# Altium PCB STPMotorControl_1.PcbDoc
Units mm, origin at the board's own origin, x right, y up, seen from the top; angles counter-clockwise.
Board outline 115.25 x 87.88 mm, 6 copper layers (Top Layer, Int1 (GND), Int2 (Sign), Int3 (Sign), Int4 (GND), Bottom Layer), stack 1.551 mm thick; 90 components, 72 nets, 381 pads, 78 vias.
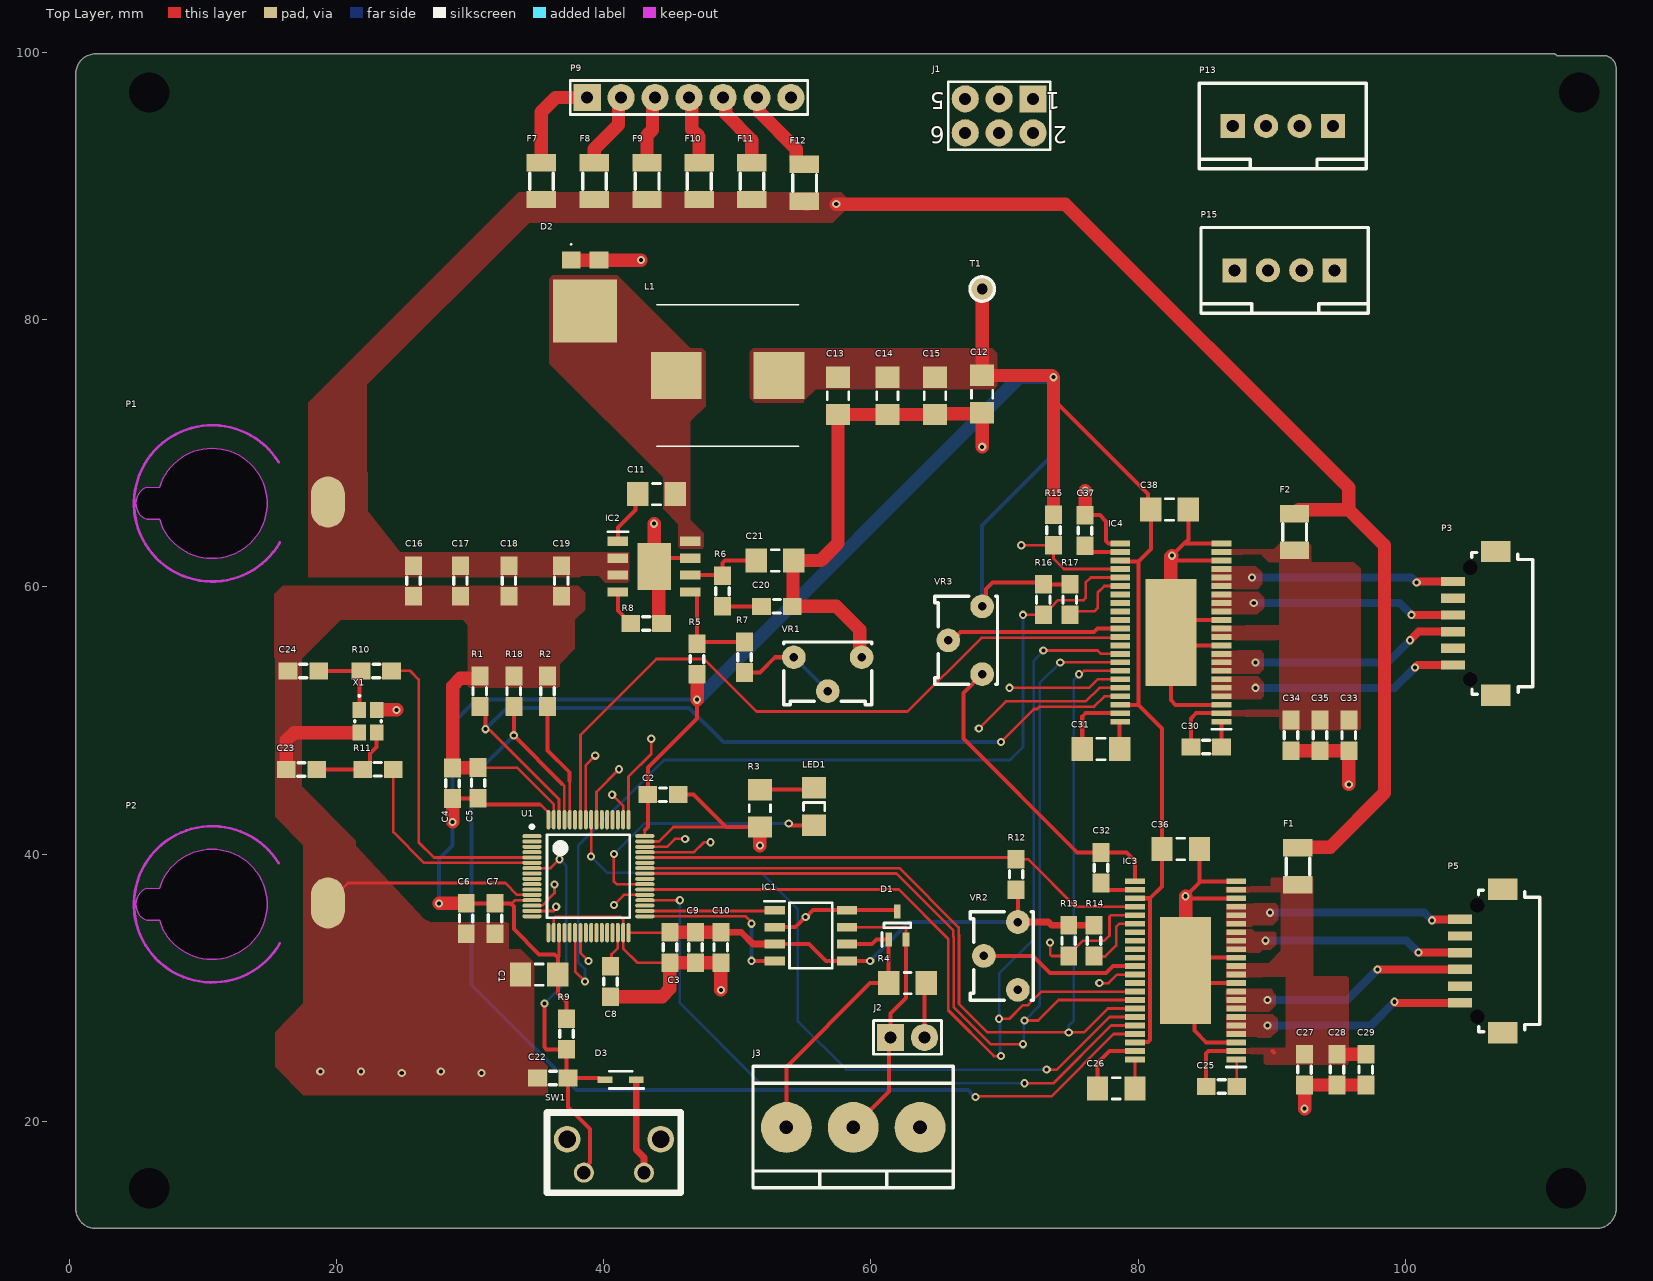
[diagram p0: Top Layer view]
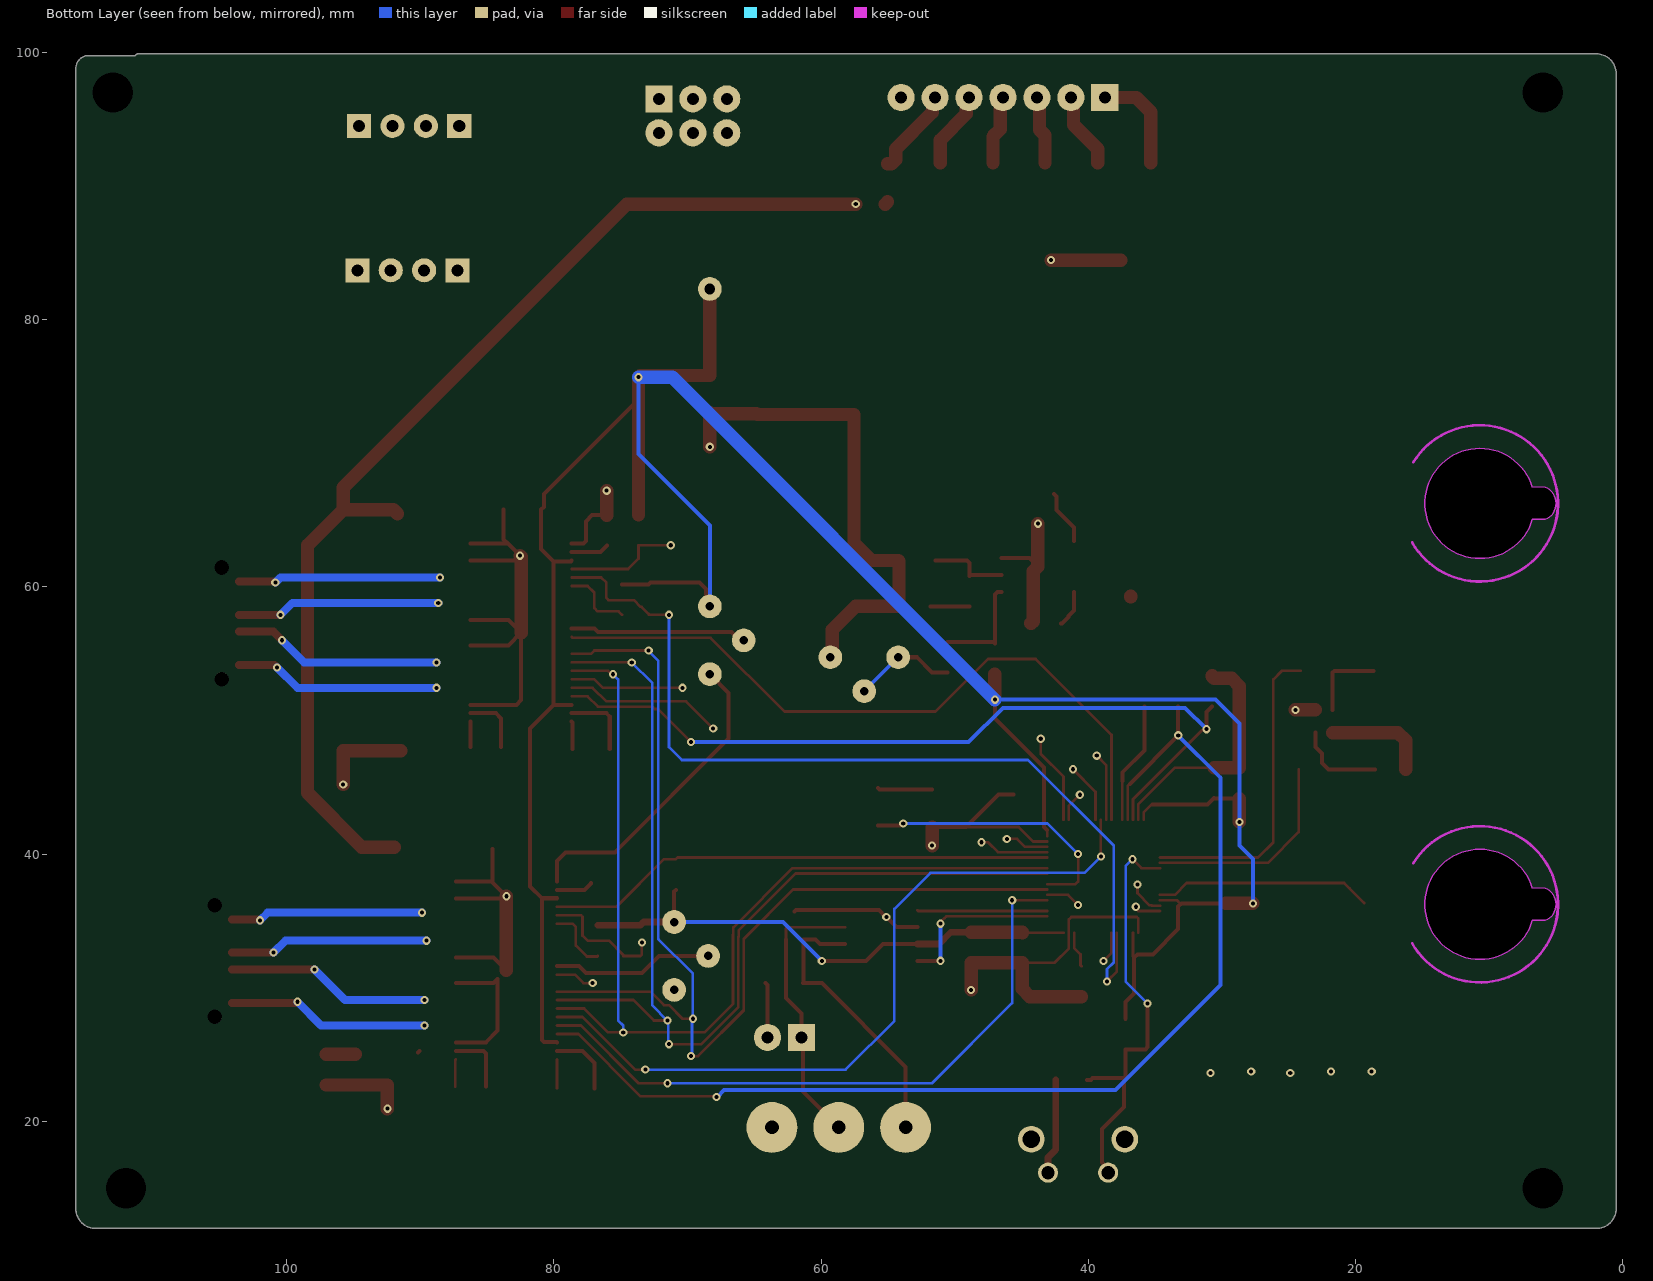
[diagram p1: Bottom Layer view, seen from below]
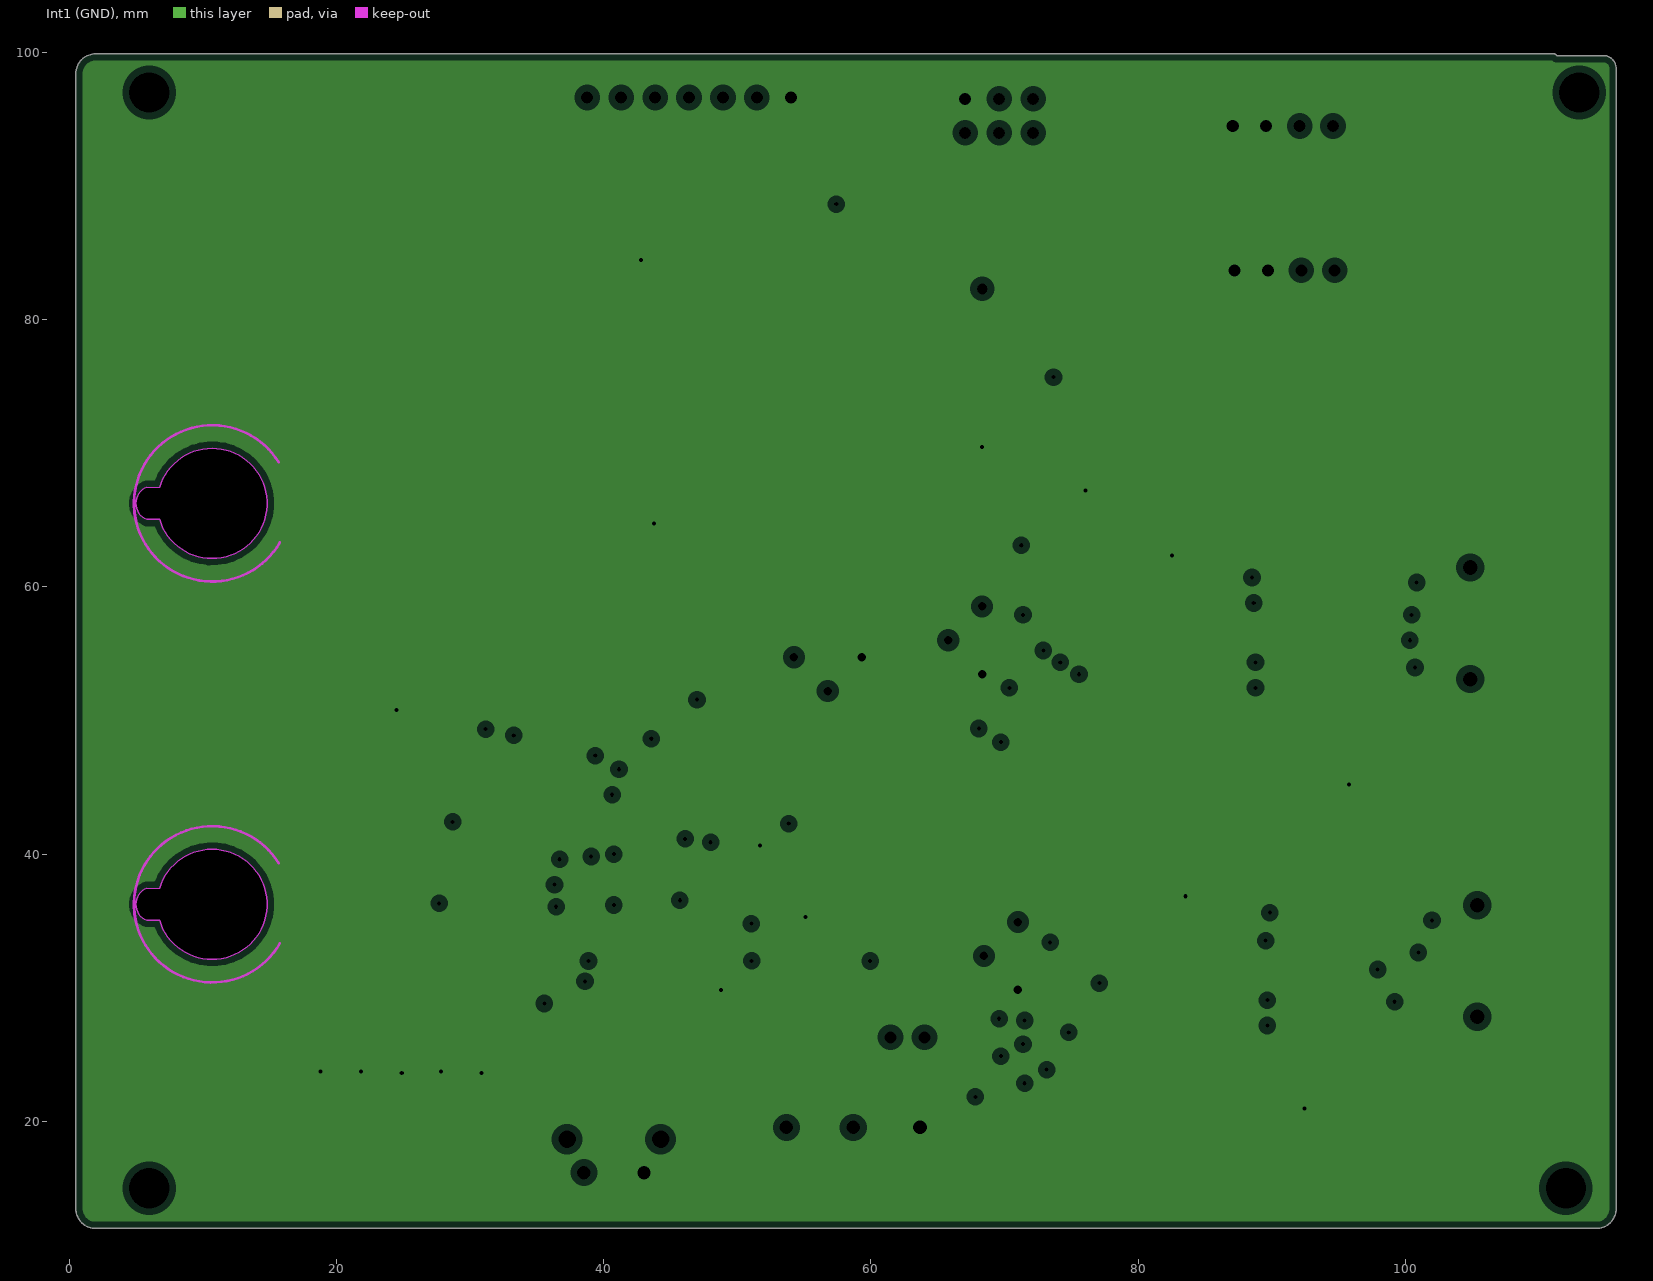
[diagram p2: Int1 (GND), clearances drawn from the general rule]
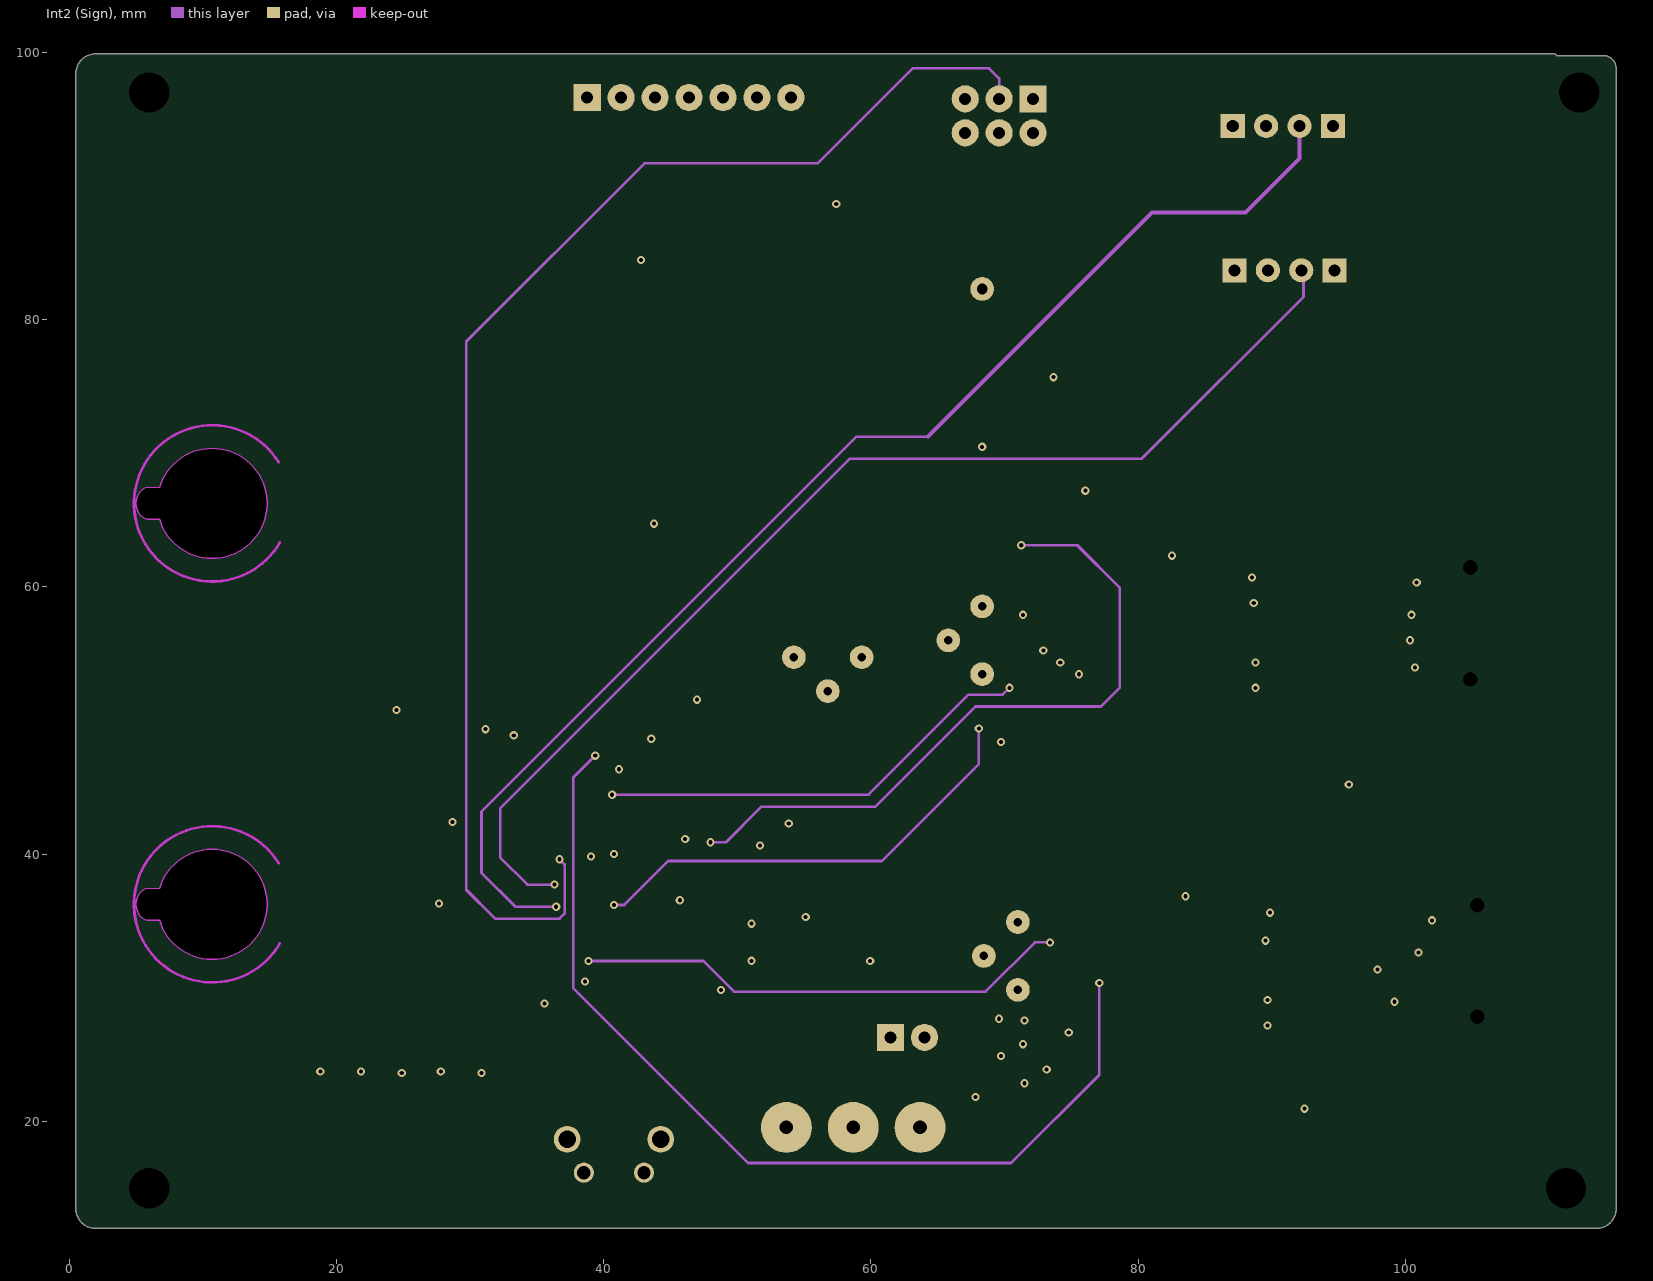
[diagram p3: Int2 (Sign)]
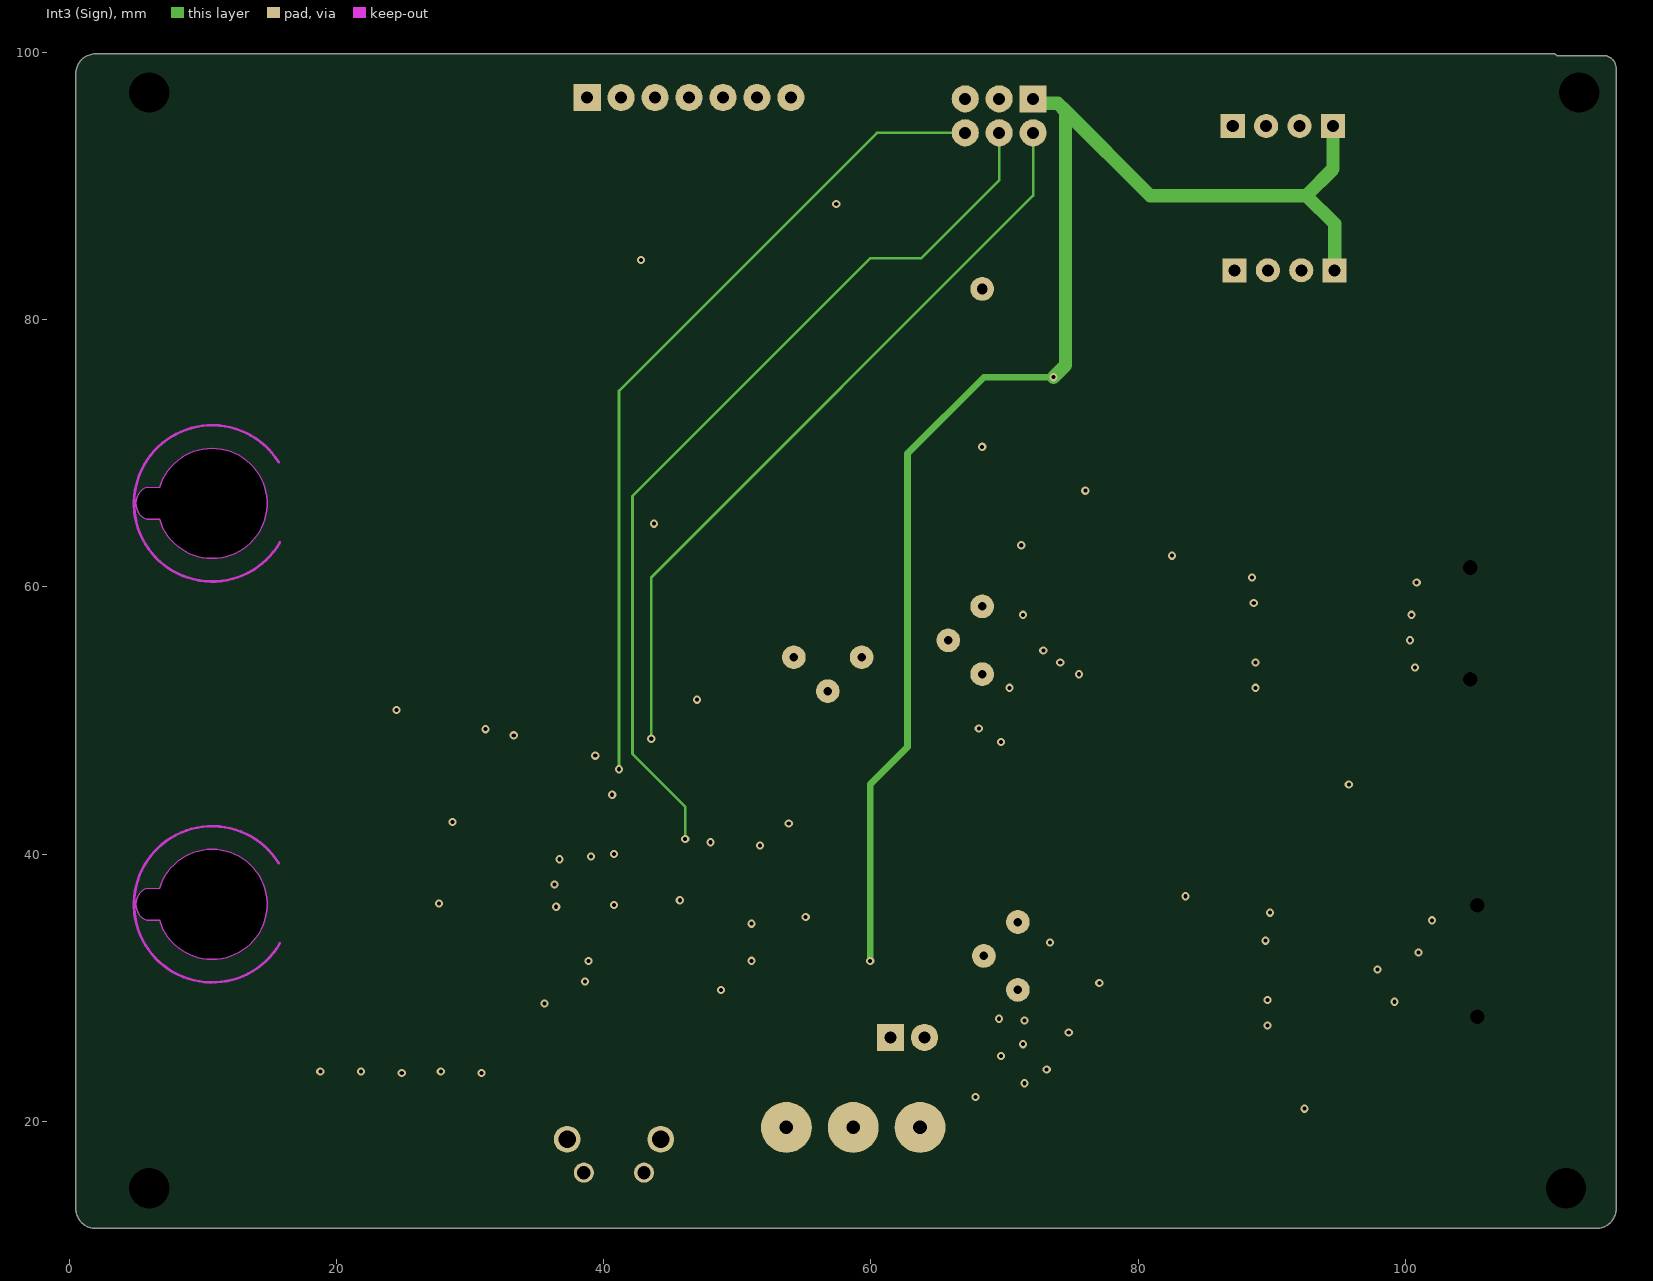
[diagram p4: Int3 (Sign)]
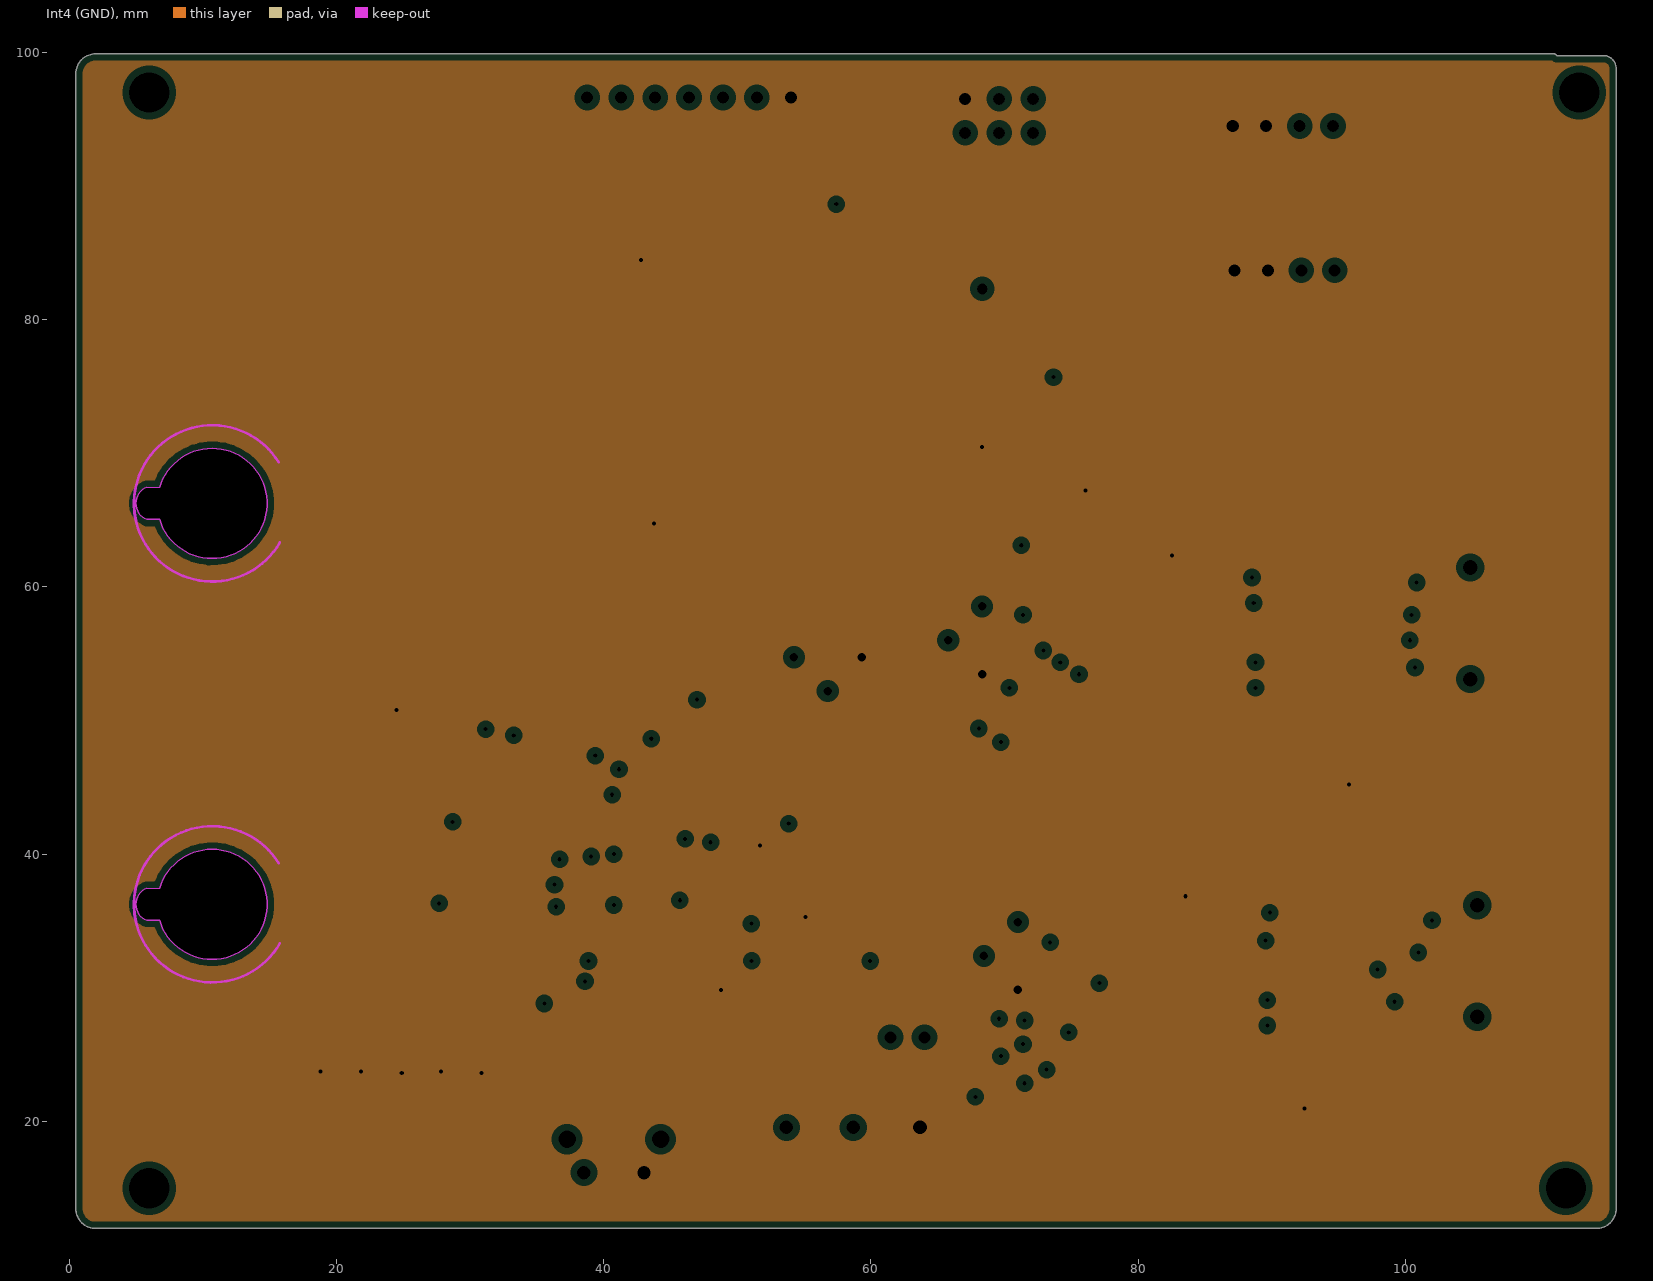
[diagram p5: Int4 (GND), clearances drawn from the general rule]
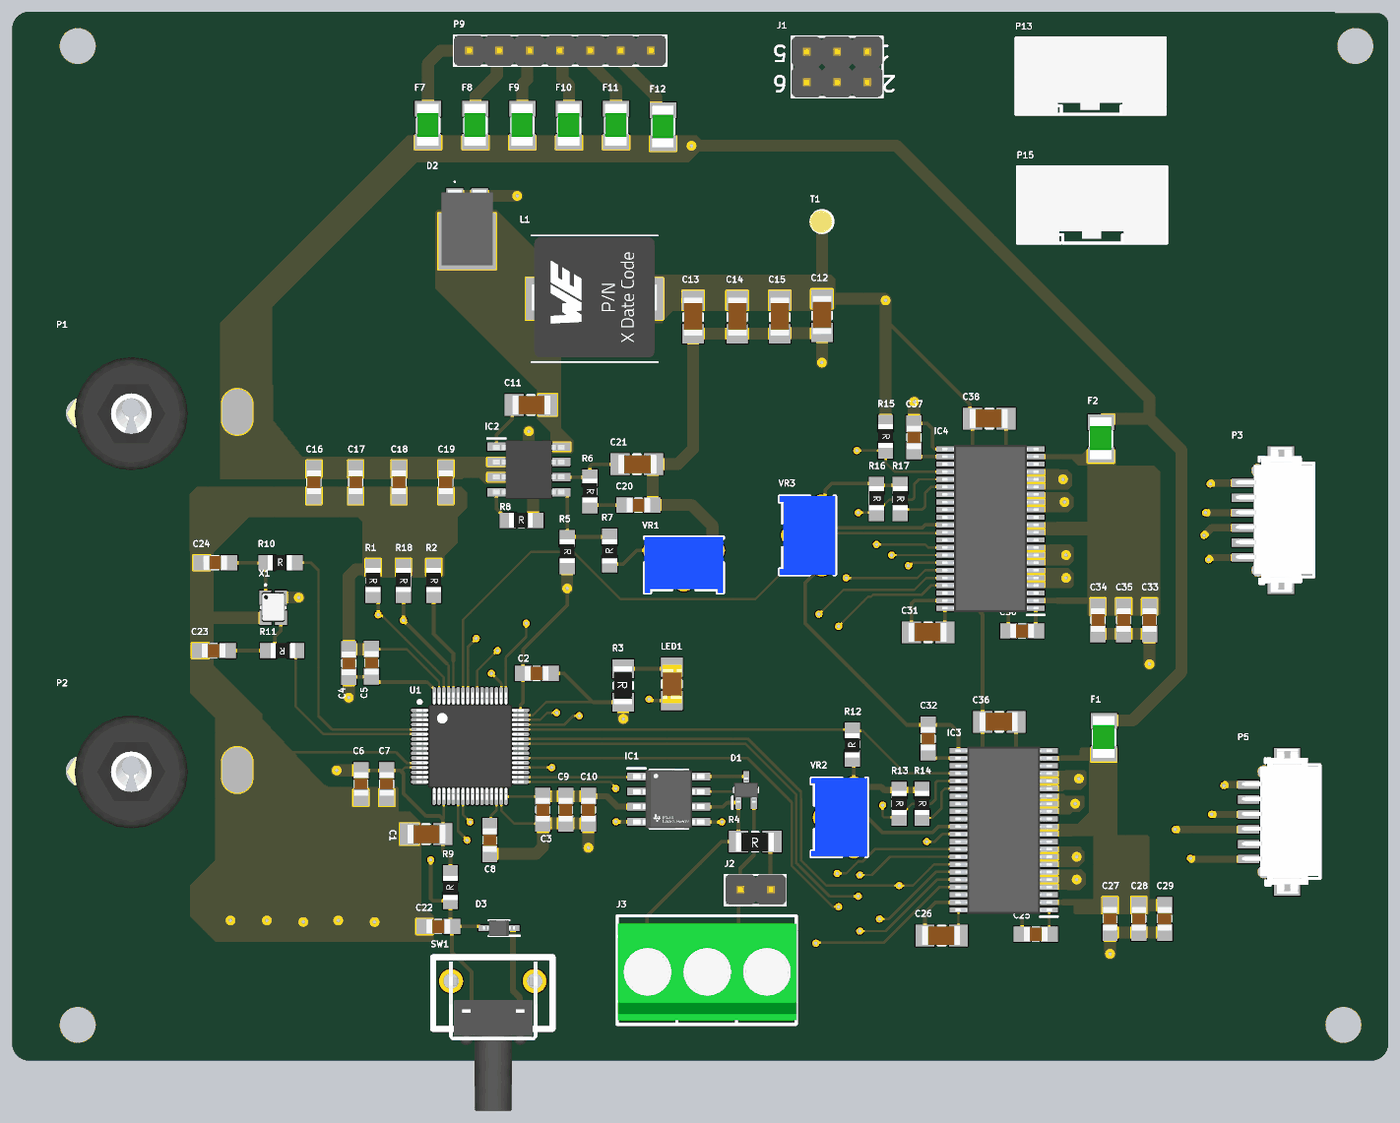
[diagram p6: 3D render of the assembled board from above, using the file's embedded part models]

## Layer stack, top to bottom
Top Solder: solder mask 0.0254, SM-001, Dk 4
Top Layer: signal copper 0.035
Dielectric 1: prepreg 0.0711, PP-006, Dk 4.1
Dielectric 2: prepreg 0.0711, PP-006, Dk 4.1
Int1 (GND): plane copper 0.035, net GND
Dielectric 3: core 0.4572, Core-035, Dk 4.7
Int2 (Sign): signal copper 0.035
Dielectric 4: prepreg 0.0711, PP-006, Dk 4.1
Dielectric 5: prepreg 0.0711, PP-006, Dk 4.1
Int3 (Sign): signal copper 0.035
Dielectric 6: core 0.4572, Core-035, Dk 4.7
Int4 (GND): plane copper 0.035, net GND
Dielectric 7: prepreg 0.0711, PP-006, Dk 4.1
Dielectric 8: prepreg 0.0711, PP-006, Dk 4.1
Bottom Layer: signal copper 0.035
Bottom Solder: solder mask 0.0254, SM-001, Dk 4

## Board outline
0.508,13.462 0.508,16.002 0.508,98.425 cw(c1.968,98.425) 1.968,99.886 111.125,99.886 cw(c111.125,99.695) 111.305,99.759 114.808,99.759 cw(c114.808,98.806) 115.761,98.806 115.761,18.288 115.761,13.462 cw(c114.3,13.462) 114.3,12.001 1.968,12.001 cw(c1.968,13.462)

## Design rules (kind name [scope] priority, off if disabled: settings)
Clearance [All] p1: gap=0.2 ignorepadtopadclearanceinfootprint=TRUE except(0.05: Arc-SMDPad Track-SMDPad)
PlaneClearance [All] p1: clearance=0.508
PlaneConnect [All] p1: planeconnectstyle=Direct reliefexpansion=0.508 reliefentries=4 reliefconductorwidth=0.254 reliefairgap=0.254
PolygonConnect [All] p1: connectstyle=Direct reliefconductorwidth=0.254 reliefentries=4 polygonreliefangle="90 Angle" airgapwidth=0.254
RoutingVias [All] p1: holewidth=0.305 width=0.61 viastyle="Through Hole" minholewidth=0.305 minwidth=0.61 maxholewidth=0.305 maxwidth=0.61
SolderMaskExpansion [All] p1: expansion=0.102 istentingtop=FALSE
SupplyNets "Schematic Supply Nets_2" [InNet('+3V3')] p1: voltage=0.000
SupplyNets "Schematic Supply Nets_1" [InNet('GND')] p2: voltage=0.000
SupplyNets "Schematic Supply Nets" [InNet('+48V')] p3: voltage=0.000
UnRoutedNet [All] p1: checkbadconnections=TRUE
Width [All] p1: maxlimit=1 minlimit=0.2 preferedwidth=0.3 minimp=50.000000 maximp=50.000000 favimp=50.000000
27 further rules are at their usual default settings.

## Classes and differential pairs
component class Designator: C11 C12 C13 C14 C15 C16 C17 C18 C19 C20 C21 C22 C23 C24 D2 D3 IC2 L1 P1 P2 R5 R6 R7 R8 R9 R10 R11 SW1 T1 VR1 X1

## Components (designator, comment, footprint, x,y, rotation, side; value= is the part's Value field where it differs from the comment)
C1 "4.7uF" CAP_1206 33.776,30.988 r0 top
C2 "100nF" CAP_0805 45.593,44.45 r180 top
C3 "100nF" CAP_0805 44.958,31.877 r90 top
C4 "100nF" CAP_0805 28.695,46.448 r270 top
C5 "100nF" CAP_0805 30.607,46.482 r270 top
C6 "1uF" CAP_0805 29.718,34.036 r90 top
C7 "100nF" CAP_0805 31.877,34.036 r90 top
C8 "2.2uF" CAP_0805 40.513,31.623 r270 top
C9 "1uF" CAP_0805 46.863,31.877 r90 top
C10 "100nF" CAP_0805 48.768,31.877 r90 top
C11 "0.1uF" CAP_1206 42.558,66.94 r0 top
C12 "10uF" CAP_1206 68.326,73.025 r90 top
C13 "47uF" CAP_1206 57.531,72.898 r90 top
C14 "47uF" CAP_1206 61.231,72.898 r90 top
C15 "47uF" CAP_1206 64.789,72.898 r90 top
C16 "2.2uF" CAP_0805 25.781,59.309 r90 top
C17 "2.2uF" CAP_0805 29.276,59.309 r90 top
C18 "2.2uF" CAP_0805 32.907,59.309 r90 top
C19 "2.2uF" CAP_0805 36.828,59.309 r90 top
C20 "10nF" CAP_0805 51.816,58.547 r0 top
C21 "220pF" CAP_1206 51.429,61.976 r0 top
C22 "100nF" CAP_0805 35.052,23.241 r0 top
C23 "7pF" CAP_0805 18.542,46.355 r180 top
C24 "7pF" CAP_0805 18.669,53.721 r180 top
C25 "1uF" CAP_0805 85.09,22.606 r0 top
C26 "0.1uF" CAP_1206 79.756,22.479 r180 top
C27 "1uF" CAP_0805 92.456,22.733 r90 top
C28 "10nF" CAP_0805 94.869,22.733 r90 top
C29 "10nF" CAP_0805 97.028,22.733 r90 top
C30 "1uF" CAP_0805 83.947,48.006 r0 top
C31 "0.1uF" CAP_1206 78.613,47.879 r180 top
C32 "1uF" CAP_0805 77.216,40.132 r270 top
C33 "1uF" CAP_0805 95.758,47.752 r90 top
C34 "10nF" CAP_0805 91.44,47.752 r90 top
C35 "10nF" CAP_0805 93.599,47.752 r90 top
C36 "0.1uF" CAP_1206 84.582,40.386 r180 top
C37 "1uF" CAP_0805 76.026,65.37 r270 top
C38 "0.1uF" CAP_1206 83.747,65.786 r180 top
D1 "ESDCAN03-2BWY" SOT65P210X110-3N 61.976,34.671 r90 top
D2 "SS5P6-M3_87A" SS5P6M387A 38.608,81.685 r180 top
D3 "TSD05CDYFR" SOD2613X100N 41.275,23.114 r180 top
F1 "1206L035/16YR" MC36207 91.948,37.719 r90 top
F2 "1206L035/16YR" MC36207 91.694,62.738 r90 top
F7 "1206L035/16YR" MC36207 35.34,88.993 r90 top
F8 "1206L035/16YR" MC36207 39.304,88.993 r90 top
F9 "1206L035/16YR" MC36207 43.241,88.993 r90 top
F10 "1206L035/16YR" MC36207 47.139,88.993 r90 top
F11 "1206L035/16YR" MC36207 51.088,88.993 r90 top
F12 "1206L035/16YR" MC36207 55.025,88.866 r90 top
IC1 "TCAN3403DRQ1" SOIC127P600X175-8N 55.499,33.909 r0 top
IC2 "RT6365GSP" SOIC127P600X175-9N 43.776,61.522 r0 top
IC3 "DRV8462DDWR" SOP64P810X120-45N 83.544,31.305 r180 top
IC4 "DRV8462DDWR" SOP64P810X120-45N 82.445,56.579 r180 top
J1 "HDR3X2" HDR2X3_AUT 72.136,96.52 r180 top
J2 "HDR1X2V" HDR1X2_AUT 61.468,26.289 r0 top
J3 "SCREWX3" SCREW3_AUT 63.674,19.558 r180 top
L1 "7.8uH" WE-HCI_103023 49.276,75.819 r0 top
LED1 "LED-RED" LED1206R 55.753,42.164 r90 top
P1 "BS" Banana_AUT 10.71,66.251 r180 top
P2 "BS" Banana_AUT 10.71,36.251 r180 top
P3 "DF13-6P" DF13-6 105.156,57.277 r270 top
P5 "DF13-6P" DF13-6 105.664,32.004 r270 top
P9 "HDR1X7V" HDR1X7_AUT 38.769,96.622 r0 top
P13 "JST 4" XA-4 87.075,94.488 r0 top
P15 "JST 4" XA-4 87.202,83.693 r0 top
R1 "5k1" RES_0805 30.734,53.34 r270 top
R2 "10k" RES_0805 35.814,53.34 r270 top
R3 "1k" RES_1206 51.689,44.831 r270 top
R4 "120R" RES_1206 61.341,30.353 r0 top
R5 "31k6" RES_0805 46.99,55.753 r270 top
R6 "5k36" RES_0805 48.895,60.833 r270 top
R7 "9k1" RES_0805 50.546,53.594 r90 top
R8 "332k" RES_0805 42.037,57.277 r0 top
R9 "10k" RES_0805 37.211,25.4 r90 top
R10 "0R" RES_0805 21.844,53.721 r0 top
R11 "0R" RES_0805 24.257,46.355 r180 top
R12 "10k" RES_0805 70.866,37.338 r90 top
R13 "10k" RES_0805 74.803,34.671 r270 top
R14 "10k" RES_0805 76.708,34.671 r270 top
R15 "10k" RES_0805 73.66,65.405 r270 top
R16 "10k" RES_0805 72.898,60.198 r270 top
R17 "10k" RES_0805 74.881,60.193 r270 top
R18 "5k1" RES_0805 33.274,53.34 r270 top
SW1 "EVQPF" EVQPF203M 40.767,18.669 r0 top
T1 "Terminal1" PAD1_AUT 68.326,82.296 r0 top
U1 "STM32C552RET6" LQFP40P900X900X145-64N 38.862,38.354 r0 top
VR1 "2k" 3362S 56.769,53.467 r180 top
VR2 "30k" 3362S 69.723,32.385 r90 top
VR3 "30k" 3362S 67.056,56.007 r90 top
X1 "24MHz" CX2520SB 21.717,50.8 r270 top

## Footprints (in the part's own frame and the unit in brackets; to place one, negate y for a bottom-side part, rotate by r counter-clockwise, add the part's x,y. Pads: shape width x height; smd on the part's side, far side on the other; paste and mask are expansions set on the pad)
3362S [mil] "3362 - 1/4 ” Square Trimpot, Trimming Potentiometer"
  round 70 hole 25: 1(100,-50) 2(-100,-50) W(0,50)
  silkscreen extent -130,-95 130,90, body extent -130,-95 130,91, height 278
Banana_AUT [mm] "Power (11mm Diameter, 15.5mm Length)"
  oval 2.54x3.81 smd: 1(-8.65,-0.1)
  Keep-Out Layer board cut-out: 3.945,-1.205 2.834,-2.995 0.983,-4.002 -1.124,-3.962 -2.935,-2.885 -3.978,-1.054 -3.978,1.054 -2.935,2.885 -1.124,3.962 0.983,4.002 2.834,2.995 3.945,1.205 3.945,1.205 4.902,1.205 4.902,1.205 5.399,0.849 5.679,0.306 5.679,-0.306 5.399,-0.849 4.902,-1.205 4.902,-1.205 4.902,-1.205
  Keep-Out Layer lines w0.025: 4.902,1.205 cw(c4.416,0) 4.902,-1.205 3.945,-1.205 cw(c0.005,0) 3.945,1.205 4.902,1.205
  Keep-Out Layer lines w0.2: -4.969,-3.079 ccw(c0.005,0) -5.062,2.923
  body extent -5.17,-4.7 5.62,4.8, height 4.57
CAP_0805 [mil] "Body 2.0 x 1.3mm (LxW typ)"
  rect 55x50 smd: 1(0,0) 2(90,0)
  silkscreen extent 35,-20 56,20, body extent 6,-24 85,24, height 47
CAP_1206 [mm] "Body 3.2 x 1.6 mm (LxW typ)"
  rect 1.6x1.8 smd: 1(0,0) 2(2.8,0)
  silkscreen extent 1.1,-0.8 1.7,0.8, body extent -0.15,-0.81 3.05,0.79, height 1.6
CX2520SB [mm] "Crystal Units, Body 2.5×2.0 mm (LxW)"
  rect 1.2x1 smd: 1(0,0) 2(1.7,0) 3(1.7,1.3) 4(0,1.3)
  silkscreen extent -1.1,-0.35 0.87,1.65, body extent -0.45,-0.35 2.05,1.65, height 0.79
DF13-6 [mm] "HIROSE Right Angle, DF13 Series, Surface Mount, Header, 6 Contacts, 1.25 mm"
  rect 1.6x2.2 smd: 0(-5.375,1.6) 0(5.375,1.6)
  round 1 hole 1.1: 0(-4.175,-0.3) 0(4.175,-0.3)
  rect 0.7x1.8 smd: 1(-3.125,-1.6) 2(-1.875,-1.6) 3(-0.625,-1.6) 4(0.625,-1.6) 5(1.875,-1.6) 6(3.125,-1.6)
  silkscreen extent -5.3,-0.2 5.3,4.37, body extent -6.12,-2.15 6.03,4.35, height 3.58
EVQPF203M [mm] "PANASONIC  EVQPF203M  SWITCH, TACTILE, SPST-NO, 20mA, 15VDC"
  round 2 hole 1.3: 0(-3.5,0) 0(3.5,0)
  round 1.5 hole 1: 1(-2.25,-2.5) 2(2.25,-2.5)
  silkscreen extent -5,-4 5,2, body extent -3.67,-10.87 3.73,1.63, height 7
HDR1X2_AUT [mil] "Connector; Header; 2 Position; Pitch 2.54mm, Straight"
  rect 80x80 hole 35.43: 1(0,0)
  round 80 hole 35.43: 2(100,0)
  silkscreen extent -50,-50 150,50, body extent -48,-48 152,52, height 399
HDR1X7_AUT [mil] "Connector; Header; 7 Position; Pitch 2.54mm, Straight"
  rect 80x80 hole 35.43: 1(0,0)
  round 80 hole 35.43: 2(100,0) 3(200,0) 4(300,0) 5(400,0) 6(500,0) 7(600,0)
  silkscreen extent -50,-50 650,50, body extent -50,-50 650,50, height 398
HDR2X3_AUT [mil] "Connector; Header; 3x2 Position"
  rect 80x80 hole 35.43: 1(0,0)
  round 80 hole 35.43: 2(0,100) 3(100,0) 4(100,100) 5(200,0) 6(200,100)
  silkscreen extent -50,-50 250,150, body extent -50,-50 250,150, height 398
LED1206R [mm] "SMD; Red LED; Body 3.2 x 1.6 mm"
  rect 1.6x1.8 smd: A(0,0) K(2.8,0)
  silkscreen extent 1.1,-0.8 1.7,0.8, body extent -0.2,-0.84 3,0.76, height 1.09
LQFP40P900X900X145-64N [mm] "LQFP, 64-Leads, Body 7.00x7.00mm, Pitch 0.40mm, IPC Medium Density"
  oval 1.45x0.3 smd: 1(-4.225,3) 2(-4.225,2.6) 3(-4.225,2.2) 4(-4.225,1.8) 5(-4.225,1.4) 6(-4.225,1) 7(-4.225,0.6) 8(-4.225,0.2) 9(-4.225,-0.2) 10(-4.225,-0.6) 11(-4.225,-1) 12(-4.225,-1.4) 13(-4.225,-1.8) 14(-4.225,-2.2) 15(-4.225,-2.6) 16(-4.225,-3) 33(4.225,-3) 34(4.225,-2.6) 35(4.225,-2.2) 36(4.225,-1.8) 37(4.225,-1.4) 38(4.225,-1) 39(4.225,-0.6) 40(4.225,-0.2) 41(4.225,0.2) 42(4.225,0.6) 43(4.225,1) 44(4.225,1.4) 45(4.225,1.8) 46(4.225,2.2) 47(4.225,2.6) 48(4.225,3)
  oval 0.3x1.45 smd: 17(-3,-4.225) 18(-2.6,-4.225) 19(-2.2,-4.225) 20(-1.8,-4.225) 21(-1.4,-4.225) 22(-1,-4.225) 23(-0.6,-4.225) 24(-0.2,-4.225) 25(0.2,-4.225) 26(0.6,-4.225) 27(1,-4.225) 28(1.4,-4.225) 29(1.8,-4.225) 30(2.2,-4.225) 31(2.6,-4.225) 32(3,-4.225) 49(3,4.225) 50(2.6,4.225) 51(2.2,4.225) 52(1.8,4.225) 53(1.4,4.225) 54(1,4.225) 55(0.6,4.225) 56(0.2,4.225) 57(-0.2,4.225) 58(-0.6,4.225) 59(-1,4.225) 60(-1.4,4.225) 61(-1.8,4.225) 62(-2.2,4.225) 63(-2.6,4.225) 64(-3,4.225)
  silkscreen extent -4.35,-3.1 3.1,3.82, body extent -4.5,-4.5 4.5,4.5, height 1.45
MC36207 [mm] "FUSE, PTC RESET. 3.5x1.8x0.75mm (LxWxH)"
  rect 1.3x2.2 smd: 1(0,0) 2(2.75,0)
  silkscreen extent 0.75,-0.9 1.98,0.87, body extent -0.35,-0.88 3.15,0.92, height 0.75
PAD1_AUT [mil] "Teminal Pad; 70 x 70 mil; Hole, 32mil"
  round 70 hole 32: 1(0,0)
  silkscreen extent -36,-36 36,36, body extent -40,-37 34,37, height 319
RES_0805 [mil] "Body 2.0 x 1.3mm (LxW typ)"
  rect 55x50 smd: 1(0,0) 2(90,0)
  silkscreen extent 35,-20 56,20, body extent 3,-25 82,24, height 20
RES_1206 [mm] "Body 3.2 x 1.6 mm (LxW typ)"
  rect 1.6x1.8 smd: 1(0,0) 2(2.8,0)
  silkscreen extent 1.14,-0.8 1.65,0.8, body extent -0.21,-0.8 2.96,0.75, height 0.6
SCREW3_AUT [mil] "PCB Terminal Interlocking Block; CMM; 3 Poles; Pitch, 5 mm"
  round 150 hole 40: 1(0,0) 2(196.85,0) 3(393.7,0)
  silkscreen extent -98,-180 492,178, body extent -100,-155 490,164, height 394
SOD2613X100N [mm]
  rect 1.1x0.5 smd: 1(-1.175,0) 2(1.175,0)
  silkscreen extent -1.73,-0.65 0.85,0.65, body extent -1.33,-0.65 1.33,0.65, height 1
SOIC127P600X175-8N [mm]
  rect 1.528x0.65 smd: 1(-2.711,1.905) 2(-2.711,0.635) 3(-2.711,-0.635) 4(-2.711,-1.905) 5(2.711,-1.905) 6(2.711,-0.635) 7(2.711,0.635) 8(2.711,1.905)
  silkscreen extent -3.47,-2.45 1.6,2.58, body extent -3,-2.45 3,2.45, height 1.75
SOIC127P600X175-9N [mm]
  rect 1.522x0.7 smd: 1(-2.714,1.905) 2(-2.714,0.635) 3(-2.714,-0.635) 4(-2.714,-1.905) 5(2.714,-1.905) 6(2.714,-0.635) 7(2.714,0.635) 8(2.714,1.905)
  rect 2.5x3.5 smd: 9(0,0)
  silkscreen extent -3.48,2.6 -1.95,2.6, body extent -3,-2.45 3,2.45, height 1.46
SOP64P810X120-45N [mm]
  rect 1.475x0.435 smd: 1(-3.788,6.668) 2(-3.788,6.032) 3(-3.788,5.398) 4(-3.788,4.762) 5(-3.788,4.128) 6(-3.788,3.492) 7(-3.788,2.858) 8(-3.788,2.222) 9(-3.788,1.588) 10(-3.788,0.952) 11(-3.788,0.318) 12(-3.788,-0.318) 13(-3.788,-0.952) 14(-3.788,-1.588) 15(-3.788,-2.222) 16(-3.788,-2.858) 17(-3.788,-3.492) 18(-3.788,-4.128) 19(-3.788,-4.762) 20(-3.788,-5.398) 21(-3.788,-6.032) 22(-3.788,-6.668) 23(3.788,-6.668) 24(3.788,-6.032) 25(3.788,-5.398) 26(3.788,-4.762) 27(3.788,-4.128) 28(3.788,-3.492) 29(3.788,-2.858) 30(3.788,-2.222) 31(3.788,-1.588) 32(3.788,-0.952) 33(3.788,-0.318) 34(3.788,0.318) 35(3.788,0.952) 36(3.788,1.588) 37(3.788,2.222) 38(3.788,2.858) 39(3.788,3.492) 40(3.788,4.128) 41(3.788,4.762) 42(3.788,5.398) 43(3.788,6.032) 44(3.788,6.668)
  rect 3.8x8 smd: 45(0,0)
  silkscreen extent -4.53,7.23 -3.05,7.23, body extent -4.05,-7 4.05,7, height 1.2
SOT65P210X110-3N [mm]
  rect 1.05x0.5 smd: 1(-1.05,0.65) 2(-1.05,-0.65) 3(1.05,0)
  silkscreen extent -1.58,-1 0.18,1.15, body extent -1.05,-1 1.05,1, height 1.1
SS5P6M387A [mm]
  rect 1.4x1.27 smd: 1(1.04,-2.765) 2(-1.04,-2.765)
  rect 4.8x4.72 smd: 3(0,1.04)
  silkscreen extent 0.99,-4 1.09,-3.9, body extent -2.15,-3.27 2.15,3.05, height 1.3
WE-HCI_103023 [mm]
  rect 3.8x3.5 smd: 1(-3.85,0) 2(3.85,0)
  silkscreen extent -5.3,-5.3 5.3,5.3, body extent -5.25,-4.9 5.25,5.16, height 4.96
XA-4 [mm] "XA Connector (JST), 4 Pins, Pitch 2.5mm"
  rect 1.8x1.8 hole 0.9: 1(7.5,0) 4(0,0)
  round 1.8 hole 0.9: 2(5,0) 3(2.5,0)
  silkscreen extent -2.5,-3.2 10,3.2, body extent -2.55,-3.23 9.95,3.17, height 8.8

## Part data
C1 C11 C12 C13 C14 C15 C21 C26 C31 C36 C38: library part "CAPN 1206", "Non Polarized Capacitor, SMD, 1206"
C2 C3 C4 C5 C6 C7 C8 C9 C10 C16 C17 C18 C19 C20 C22 C23 C24 C25 C27 C28 C29 C30 C32 C33 C34 C35 C37: library part "CAPN 0805", "Non Polarized Capacitor, SMD, 0805"
D1: "TVS Diode (Uni-directional)", Manufacturer_Name=STMicroelectronics, Mouser Part Number=511-ESDCAN03-2BWY, Arrow Part Number=ESDCAN03-2BWY, Arrow Price/Stock=https://www.arrow.com/en/products/esdcan03-2bwy/stmicroelectronics.html?utm_currency=USD&region=europe, Datasheet Link=https://www.st.com/resource/en/datasheet/esdcan03-2bwy.pdf, Height=1.1mm, Manufacturer_Part_Number=ESDCAN03-2BWY, Mouser Price/Stock=https://www.mouser.co.uk/ProductDetail/STMicroelectronics/ESDCAN03-2BWY?qs=FqY30PPN9V2iiokjuqa22Q%3D%3D
D2: "Schottky Diode", Arrow Part Number=SS5P6-M3/87A, Manufacturer_Name=Vishay, Mouser Part Number=625-SS5P6-M3/87A, Arrow Price/Stock=https://www.arrow.com/en/products/ss5p6-m387a/vishay?utm_currency=USD&region=nac, Datasheet Link=https://www.vishay.com/docs/88988/ss5p6.pdf, Height=1.2mm, Manufacturer_Part_Number=SS5P6-M3/87A, Mouser Price/Stock=https://www.mouser.co.uk/ProductDetail/Vishay-General-Semiconductor/SS5P6-M3-87A?qs=XGzIaZb%2FFYLx0h%2FWoI%2FVUQ%3D%3D
D3: "TVS Diode (Bi-directional)", Manufacturer_Name="Texas Instruments", Mouser Part Number=595-TSD05CDYFR, Arrow Part Number=TSD05CDYFR, Arrow Price/Stock=https://www.arrow.com/en/products/tsd05cdyfr/texas-instruments.html?utm_currency=USD&region=nac, Datasheet Link=https://www.ti.com/lit/ds/symlink/tsd05c.pdf?ts=1691730725852&ref_url=https%253A%252F%252Fwww.ti.com%252Fproduct%252FTSD05C%253FkeyMatch%253DTSD05CDYFR%2526tisearch%253Dsearch-everything%2526usecase%253DOPN, Height=1mm, Manufacturer_Part_Number=TSD05CDYFR, Mouser Price/Stock=https://www.mouser.co.uk/ProductDetail/Texas-Instruments/TSD05CDYFR?qs=Imq1NPwxi74wAiGFX0POZQ%3D%3D
F1 F2 F7 F8 F9 F10 F11 F12: "Fuse, PTC Reset, 350mA Hold, 750mA Tripping, 16v", Supplier Part Number 1=1822203, Supplier 1=Element14
IC1: "Integrated Circuit", Manufacturer_Name="Texas Instruments", Mouser Part Number=595-TCAN3403DRQ1, Arrow Part Number=TCAN3403DRQ1, Arrow Price/Stock=https://www.arrow.com/en/products/tcan3403drq1/texas-instruments?utm_currency=USD&region=nac, Datasheet Link=https://www.ti.com/lit/ds/symlink/tcan3403-q1.pdf?ts=1732780388772&ref_url=https%253A%252F%252Fwww.ti.com%252Fproduct%252FTCAN3403-Q1%252Fpart-details%252FTCAN3403DRQ1, Height=1.75mm, Manufacturer_Part_Number=TCAN3403DRQ1, Mouser Price/Stock=https://www.mouser.co.uk/ProductDetail/Texas-Instruments/TCAN3403DRQ1?qs=VVKQmw408U8i3BeOClYB9g%3D%3D
IC2: "Integrated Circuit", Manufacturer_Name=RICHTEK, Mouser Part Number=835-RT6365GSP, Datasheet Link=https://www.richtek.com/assets/product_file/RT6365/DS6365-02.pdf, Height=1.753mm, Manufacturer_Part_Number=RT6365GSP, Mouser Price/Stock=https://www.mouser.co.uk/ProductDetail/Richtek/RT6365GSP?qs=amGC7iS6iy%252BGHkAL3RFUug%3D%3D
IC3 IC4: "Integrated Circuit", Manufacturer_Name="Texas Instruments", Mouser Part Number=595-DRV8462DDWR, Arrow Part Number=DRV8462DDWR, Arrow Price/Stock=https://www.arrow.com/en/products/drv8462ddwr/texas-instruments?utm_currency=USD&region=nac, Datasheet Link=https://www.ti.com/lit/gpn/drv8462, Height=1.2mm, Manufacturer_Part_Number=DRV8462DDWR, Mouser Price/Stock=https://www.mouser.co.uk/ProductDetail/Texas-Instruments/DRV8462DDWR?qs=rQFj71Wb1eVexvYNsDfnvA%3D%3D
J1: "Header, 3-Pin, Dual row, 2.54mm Pitch, Straight", Supplier Part Number 1=9733574, Supplier 1=Farnell
J2: "Header, Plug, 2.54mm, 2 Pins, Straight", Supplier Part Number 1=2254030, Supplier 1=Farnell
J3: "Terminal Block, PCB, 3Way, Pitch 5mm", Supplier Part Number 1=9632689, Supplier 1=Farnell
L1: library part 744325780, "Inductor", Manufacturer_Name="Wurth Elektronik", Mouser Part Number=710-744325780, Datasheet Link=https://www.we-online.com/catalog/datasheet/744325780.pdf, Height=4.7mm, Manufacturer_Part_Number=744325780, Mouser Price/Stock=https://www.mouser.co.uk/ProductDetail/Wurth-Elektronik/744325780?qs=VxkwJfKV0FQ2%2FeCS8beGcw%3D%3D
LED1: library part "SMD 1206 LED-RED", "RED LED, Case 1206", Supplier Part Number 1=8530017, Supplier 1=Farnell
P1 P2: library part "Banana Socket", "Banana Socket, 4mm, Panel, Black, 10A", Supplier Part Number 1=1101113, Supplier 1=Farnell
P3 P5: "HIROSE(HRS)  DF13-6P-1.25H(20)  Wire-To-Board Connector, Right Angle, DF13 Series, Surface Mount, Header, 6 Contacts, 1.25 mm", Supplier Part Number 1=1324928, Supplier 1=Farnell
P9: "Header, Plug, 2.54mm, 7 Pins, Straight", Supplier Part Number 1=9731121, Supplier 1=Farnell
P13 P15: library part "JST XA Header 4", "JST XA Header, 4-Pin, Pitch 2.5mm", Supplier Part Number 1=9492089, Supplier 1=Farnell
R1 R2 R5 R6 R7 R8 R9 R10 R11 R12 R13 R14 R15 R16 R17 R18: library part "Resistor 0805", "Resistor, SMD, 0805"
R3 R4: library part "Resistor 1206", "Resistor, SMD, 1206"
SW1: "PANASONIC  EVQPF203M  SWITCH, TACTILE, SPST-NO, 20mA, 15VDC", Supplier Part Number 1=2079505, Supplier 1=Farnell
T1: "Terminal, Pad 70x70mil, Hole 32 mil"
U1: "Integrated Circuit", Manufacturer_Name=STMicroelectronics, Datasheet Link=https://www.st.com/resource/en/datasheet/stm32c551cc.pdf, Height=1.6mm, Manufacturer_Part_Number=STM32C552RET6
VR1 VR2 VR3: library part 3362S-1-202LF, "3362S Series, 1/4 ” Square  Potentiometer, 2k, 10%, 0.5 Watts, 1Turn", Supplier Part Number 1=2321842, Supplier 1=Farnell
X1: library part CX2520SB24000D0FLJZZ, "Crystals, 24MHz", Supplier Part Number 1=1657889, Supplier 1=Farnell

## Free pads (board coordinates)
  round 1.524 hole 3: 3(6,97) 4(6,15) 5(112,15) 6(113,97)

## Via types
v1: diameter 0.61, hole 0.305, Top Layer to Bottom Layer, 78 vias

## Nets (pads, with @x,y where several pads share a name; then routed paths per layer and width w, separated by ;. In a path a pad name is that pad's centre, name@x,y a point inside that pad or via, vN(x,y) a via of type N, cw(c..) or ccw(c..) an arc to the next point about the centre after c; other vN are vias at no path point)
+3V3: C1.2 C2.2 C3.2 C4.2 C5.2 C6.2 C7.2 C9.2 C10.2 C12.2 C13.2 C14.2 C15.2 C36.2 C38.2 IC1.3 IC1.5 IC3.25 IC3.42 IC4.25 IC4.42 J1.1 L1.2 P13.1 P15.1 R5.2 R9.2 R12.1 R13.1 R14.1 R15.1 R16.1 R17.1 T1.1 U1.13 U1.19 U1.32 U1.48 U1.64 VR2.1 VR3.1 | length 368.4
  Top Layer w0.2: 33.02,36.322 33.147,36.322 33.379,36.554 U1.13 ; 35.202,43.72 35.273,43.72 35.862,43.131 U1.64 ; 36.576,32.258 36.662,32.344 U1.19 ; U1.32 C3.2@44.924,34.129 ; U1.48 43.087,41.817
  Top Layer w0.3: C4.2 30.573,44.162 C5.2 31.083,43.72 35.202,43.72 ; C6.2 C7.2 33.02,36.322 33.274,36.068 33.274,34.417 35.179,32.512 36.322,32.512 36.576,32.258 C1.2 36.576,29.591 37.211,28.956 R9.2 ; 43.087,41.817 43.307,42.037 C2.2 43.307,46.482 46.99,50.165 v1(46.99,51.562) ; IC1.3 55.372,33.274 56.642,32.004 IC1.5 v1(59.944,32.004) ; VR3.1 68.609,58.83 68.609,59.846 69.108,60.345 72.751,60.345 R16.1 74.877,60.198 R17.1 ; R12.1 70.993,37.211 VR2.1 ; 73.66,74.041 80.741,66.96 80.741,65.992 C38.2 80.947,62.849 80.01,61.912 ; IC4.42 80.01,51.181 ; IC4.25 78.722,61.912 80.01,61.912 ; IC3.42 79.781,25.932 80.722,25.932 80.898,26.108 80.898,36.703 ; IC3.25 80.898,36.703 ; 80.01,51.181 81.782,49.409 C36.2 81.782,37.587 80.898,36.703 ; 80.01,51.181 80.01,61.912
  Top Layer w0.5: C10.2 50.292,34.163 51.181,33.274 IC1.3 ; VR2.1 73.279,34.925 73.533,34.671 R13.1 R14.1
  Top Layer w1: v1(27.686,36.322) C6.2 ; C4.2 28.695,42.425 v1(28.702,42.418) ; C3.2@44.924,34.129 C3.2 C9.2 C10.2 ; v1(46.99,51.562) R5.2 ; T1.1 C12.2 73.527,75.825 v1(73.66,75.692) 73.66,74.041 R15.1
  Int3 (Sign) w0.5: v1(59.944,32.004) 59.944,45.227 62.738,48.021 62.738,69.977 68.453,75.692 v1(73.66,75.692)
  Int3 (Sign) w1: J1.1 72.454,96.202 73.971,96.202 74.557,95.616 ; v1(73.66,75.692) 74.557,76.589 74.557,95.616 ; P13.1 94.575,91.273 92.583,89.281 ; P15.1 94.702,87.162 92.583,89.281 ; 74.557,95.616 80.892,89.281 92.583,89.281
  Bottom Layer w0.3: v1(27.686,36.322) 27.686,39.624 28.702,40.64 v1(28.702,42.418) 28.702,49.784 30.48,51.562 v1(46.99,51.562) ; v1(59.944,32.004) 62.865,34.925 VR2.1 ; VR3.1 68.326,64.611 73.66,69.945 v1(73.66,75.692)
  Bottom Layer w1: v1(46.99,51.562) 71.12,75.692 v1(73.66,75.692)
+48V: C16.2 C17.2 C18.2 C19.2 F1.2 F2.2 F7.1 F8.1 F9.1 F10.1 F11.1 F12.1 IC2.2 IC2.3 P1.1 | length 83.7
  Top Layer w1: F12.1@55.025,88.816 F12.1@55.195,88.646 ; v1(57.404,88.646) 74.549,88.646 95.758,67.437 95.758,65.786 ; F2.2 91.992,65.786 95.758,65.786 ; F1.2@91.948,40.519 94.367,40.519 98.425,44.577 98.425,63.119 95.758,65.786
ADC_DRV1: P15.2 U1.14 | length 89.3
  Top Layer w0.2: U1.14 35.239,36.154 35.258,36.173 35.411,36.173 36.322,37.084 v1(36.322,37.719)
  Int2 (Sign) w0.2: v1(36.322,37.719) 34.29,37.719 32.258,39.751 32.258,43.434 58.42,69.596 80.264,69.596 92.364,81.696 92.364,83.531 P15.2
ADC_DRV2: P13.2 U1.15 | length 97.1
  Top Layer w0.2: U1.15 36.262,35.754 36.449,35.941 v1(36.449,36.068)
  Int2 (Sign) w0.2: v1(36.449,36.068) 33.401,36.068 30.861,38.608 30.861,43.18 58.928,71.247 64.262,71.247
  Int2 (Sign) w0.3: 64.262,71.247 81.026,88.011 88.011,88.011 92.075,92.075 P13.2
AOUT1_DRV1: IC4.4 IC4.5 IC4.6 P3.6 | length 15.5
  Top Layer w0.6: v1(100.711,53.975) 100.714,53.975 100.891,54.152 P3.6
  Bottom Layer w0.6: v1(88.773,52.451) 99.187,52.451 v1(100.711,53.975)
AOUT1_DRV2: IC3.4 IC3.5 IC3.6 P5.6 | length 15.2
  Top Layer w0.6: v1(99.187,28.956) 99.19,28.956 99.267,28.879 P5.6
  Bottom Layer w0.6: v1(89.662,27.178) 97.409,27.178 v1(99.187,28.956)
AOUT2_DRV1: IC4.7 IC4.8 IC4.9 P3.4 | length 15.7
  Top Layer w0.6: v1(100.33,56.007) 100.975,56.652 P3.4
  Bottom Layer w0.6: v1(88.772,54.357) 98.68,54.357 v1(100.33,56.007)
AOUT2_DRV2: IC3.7 IC3.8 IC3.9 P5.4 | length 15.4
  Top Layer w0.6: v1(97.917,31.369) 97.919,31.371 104.056,31.371 P5.4
  Bottom Layer w0.6: v1(89.662,29.083) 95.631,29.083 v1(97.917,31.369)
BOUT1_DRV1: IC4.14 IC4.15 IC4.16 P3.3 | length 15.3
  Top Layer w0.6: v1(100.457,57.912) 100.459,57.91 103.548,57.91 P3.3
  Bottom Layer w0.6: v1(88.646,58.801) 99.568,58.801 v1(100.457,57.912)
BOUT1_DRV2: IC3.14 IC3.15 IC3.16 P5.3 | length 14.9
  Top Layer w0.5: v1(89.535,33.528) v1(89.535,33.528)
  Top Layer w0.6: v1(100.965,32.639) 100.967,32.637 104.056,32.637 P5.3
  Bottom Layer w0.6: v1(89.535,33.528) 100.076,33.528 v1(100.965,32.639)
BOUT2_DRV1: IC4.17 IC4.18 IC4.19 P3.1 | length 15.2
  Top Layer w0.6: v1(100.838,60.325) 100.841,60.325 100.918,60.402 P3.1
  Bottom Layer w0.6: v1(88.519,60.706) 100.454,60.706 100.835,60.325 v1(100.838,60.325)
BOUT2_DRV2: IC3.17 IC3.18 IC3.19 P5.1 | length 14.5
  Top Layer w0.6: v1(101.981,35.052) 101.984,35.052 102.061,35.129 P5.1
  Bottom Layer w0.6: v1(89.852,35.623) 101.409,35.623 v1(101.981,35.052)
DEBUG_SWCLK: J1.2 U1.49 | length 63.9
  Top Layer w0.2: U1.49 41.862,45.799 43.561,47.498 v1(43.561,48.641)
  Int3 (Sign) w0.2: v1(43.561,48.641) 43.561,60.706 72.136,89.281 J1.2
DEBUG_SWDIO: J1.4 U1.46 | length 71.3
  Top Layer w0.2: U1.46 44.745,40.554 45.339,41.148 v1(46.101,41.148)
  Int3 (Sign) w0.2: v1(46.101,41.148) 46.101,43.561 42.164,47.498 42.164,66.802 59.944,84.582 63.754,84.582 69.596,90.424 J1.4
DEBUG_SWO: J1.6 U1.55 | length 66.7
  Top Layer w0.2: U1.55 39.462,44.669 v1(41.148,46.355)
  Int3 (Sign) w0.2: v1(41.148,46.355) 41.148,74.676 60.452,93.98 J1.6
DIR_DRV1: IC4.40 U1.37 | length 48.8
  Top Layer w0.2: v1(40.767,36.195) 41.526,36.954 U1.37 ; v1(68.072,49.403) 70.104,51.435 76.073,51.435 77.089,52.451 IC4.40
  Int2 (Sign) w0.2: v1(40.767,36.195) 41.529,36.195 44.831,39.497 60.833,39.497 68.072,46.736 v1(68.072,49.403)
DIR_DRV2: IC3.40 U1.36 | length 48.6
  Top Layer w0.2: U1.36 v1(45.698,36.554) ; v1(71.501,22.86) 73.66,22.86 77.977,27.177 IC3.40
  Bottom Layer w0.2: v1(45.698,36.554) 45.698,28.851 51.689,22.86 v1(71.501,22.86)
ENABLE_DRV_1: IC4.41 R1.2 U1.62 | length 61.7
  Top Layer w0.2: v1(31.165,49.353) 31.243,49.275 31.497,49.275 36.662,44.11 U1.62 ; v1(69.723,48.387) 72.195,50.859 72.449,50.859 72.625,51.035 76.689,51.035 77.471,51.817 IC4.41
  Top Layer w0.3: R1.2 31.165,50.623 v1(31.165,49.353)
  Bottom Layer w0.3: v1(31.165,49.353) 32.759,50.947 46.403,50.947 48.963,48.387 v1(69.723,48.387)
ENABLE_DRV_2: IC3.41 R18.2 U1.61 | length 85.1
  Top Layer w0.2: 36.901,45.268 37.062,45.107 U1.61 ; v1(67.818,21.844) 67.857,21.883 73.503,21.883 78.163,26.543 IC3.41
  Top Layer w0.3: R18.2 v1(33.274,48.895) 36.901,45.268
  Bottom Layer w0.3: v1(33.274,48.895) 30.099,45.72 30.099,30.226 37.973,22.352 67.259,22.352 67.767,21.844 v1(67.818,21.844)
FDCAN1_RX: IC1.4 U1.33 | length 12.8
  Top Layer w0.2: U1.33 50.613,35.354 50.755,35.213 50.755,35.208 51.054,34.909 v1(51.054,34.798)
  Top Layer w0.3: v1(51.073,32.023) 51.082,32.013 52.779,32.013 IC1.4
  Bottom Layer w0.3: v1(51.054,34.798) 51.063,34.789 51.063,32.032 v1(51.073,32.023)
FDCAN1_TX: IC1.1 U1.34 | length 9.7
  Top Layer w0.2: U1.34 52.728,35.754 IC1.1
GND: C1.1 C2.1 C3.1 C4.1 C5.1 C6.1 C7.1 C8.2 C9.1 C10.1 C12.1 C13.1 C14.1 C15.1 C16.1 C17.1 C18.1 C19.1 C20.2 C21.2 C22.1 C23.2 C24.2 C27.1 C28.1 C29.1 C32.1 C33.1 C34.1 C35.1 C36.1 C37.1 C38.1 D1.3 D2.1 D2.2 D3.1 IC1.2 IC1.8 IC2.7 IC2.9 IC3.3 IC3.10 IC3.13 IC3.20 IC3.22 IC3.23 IC3.45 IC4.3 IC4.10 IC4.13 IC4.20 IC4.22 IC4.23 IC4.45 J1.5 J3.1 P2.1 P9.7 P13.3 P13.4 P15.3 P15.4 R1.1 R2.1 R3.2 R8.2 R18.1 SW1.2 U1.12 U1.18 U1.31 U1.47 U1.63 VR1.2 VR2.2 VR3.2 X1.2 X1.4 | length 262.8
  Top Layer w0.2: P2.1 19.36,36.353 20.441,37.434 20.443,37.434 20.855,37.846 32.639,37.846 33.531,36.954 U1.12 ; C5.1@30.59,46.465 33.545,46.465 36.262,43.748 U1.63 ; U1.18 36.262,35.189 36.379,35.306 41.275,35.306 41.462,35.119 U1.31 41.462,32.96 42.545,31.877 C3.1 ; U1.47 44.129,40.954 45.212,42.037 49.149,42.037 49.155,42.031
  Top Layer w0.3: IC2.9 44.411,62.157 IC2.7 ; C2.1 46.736,44.45 49.155,42.031 R3.2 ; IC1.2 54.356,34.544 v1(55.118,35.306) 55.169,35.306 55.677,35.814 IC1.8 61.883,35.814 D1.3 ; VR3.2 66.929,52.07 66.929,48.641 75.438,40.132 C32.1 79.121,40.132 79.756,39.497 IC3.23 ; C37.1 77.124,65.37 77.598,64.896 77.598,63.423 77.774,63.247 IC4.23 ; IC3.45 84.496,32.257 IC3.13 ; C38.1 83.747,63.554 83.44,63.247 ; C36.1 84.582,37.89 ; IC4.3 82.804,51.181 82.445,51.54 IC4.45 ; IC4.10 83.397,55.627 IC4.45 ; IC4.13 83.397,57.531 IC4.45 ; IC4.20 82.97,61.977 82.612,62.335 v1(82.528,62.335) 83.44,63.247 ; IC4.22 83.44,63.247 ; IC3.20@87.326,36.696 83.783,36.696 83.628,36.852 v1(83.544,36.852) 84.582,37.89 ; IC3.3 85.091,25.907 84.201,26.797 84.201,30.648 84.496,30.353 IC3.10 ; IC3.22 84.665,37.973 84.582,37.89
  Top Layer w0.5: D3.1 42.45,17.875 43.017,17.308 SW1.2
  Top Layer w1: C23.2 16.256,48.514 16.842,49.1 X1.2 ; X1.4 v1(24.511,50.8) ; C5.1@30.59,46.465 28.712,46.465 C4.1 28.695,52.571 29.281,53.157 30.599,53.157 30.734,53.292 R1.1 ; C19.1@36.828,59.245 C19.1 ; D2.1 D2.2 v1(42.794,84.45) ; C8.2 44.372,29.337 44.958,29.923 C3.1 C9.1 C10.1 v1(48.768,29.845) ; v1(43.776,64.731) IC2.9 44.125,61.173 44.125,57.412 44.259,57.277 R8.2 ; v1(51.689,40.64) R3.2 ; VR1.2 59.16,54.886 59.16,56.791 57.404,58.547 C20.2 54.165,58.61 54.165,61.912 C21.2 56.261,61.976 57.531,63.246 C13.1 C14.1 C15.1 64.853,72.962 68.263,72.962 C12.1 v1(68.326,70.485) ; C37.1 76.026,67.185 v1(76.042,67.2) ; IC4.45 82.445,62.252 v1(82.528,62.335) ; IC3.45 v1(83.544,36.852) ; C34.1 C35.1 C33.1 v1(95.758,45.212) ; v1(92.456,20.955) C27.1 C28.1 C29.1
  Bottom Layer w1: J1.5@67.005,96.571 J1.5
  other v1: 24.892,23.622 30.861,23.622 18.796,23.749 21.844,23.749 27.813,23.749
NetC8_1: C8.1 U1.30 | length 2.7
  Top Layer w0.2: C8.1 40.59,31.7 40.59,32.504 41.062,32.977 U1.30
NetC11_1: C11.1 IC2.1 | length 4.1
  Top Layer w0.3: IC2.1 41.062,64.43 42.398,65.766 42.398,66.781 C11.1
NetC11_2: C11.2 D2.3 IC2.8 L1.1
NetC20_1: C20.1 R6.2 | length 2.9
  Top Layer w0.3: R6.2 C20.1
NetC21_1: C21.1 IC2.6 R6.1 | length 6
  Top Layer w0.3: IC2.6 48.841,60.887 R6.1 48.895,61.8 49.071,61.976 C21.1
NetC23_1: C23.1 R11.2 X1.3 | length 6.6
  Top Layer w0.3: C23.1 R11.2 22.034,46.355 22.519,46.84 22.519,47.538 23.017,48.036 X1.3
NetC24_1: C24.1 R10.1 X1.1 | length 6.1
  Top Layer w0.3: C24.1 R10.1@21.59,53.721 ; X1.1 R10.1@21.717,53.594 ; R10.1@21.59,53.721 R10.1@21.717,53.594 ; R10.1@21.59,53.721 R10.1@21.717,53.594
NetC25_1: C25.1 C27.2 C28.2 C29.2 F1.1 IC3.2 IC3.11 IC3.12 IC3.21 | length 7.1
  Top Layer w0.3: C25.1 85.09,25.097 85.266,25.273 IC3.2 ; 90.043,25.273 90.17,25.146
  Top Layer w1: C28.2 C29.2
NetC25_2: C25.2 IC3.1 | length 2
  Top Layer w0.2: IC3.1 87.376,24.593 C25.2
NetC26_1: C26.1 IC3.44 | length 2.2
  Top Layer w0.2: C26.1 IC3.44
NetC26_2: C26.2 IC3.43 | length 5.1
  Top Layer w0.3: C26.2 76.956,24.378 77.851,25.273 IC3.43
NetC30_1: C30.1 C33.2 C34.2 C35.2 F2.1 IC4.2 IC4.11 IC4.12 IC4.21 | length 4.6
  Top Layer w0.3: C30.1 83.947,50.165 84.329,50.547 IC4.2
NetC30_2: C30.2 IC4.1 | length 1.9
  Top Layer w0.3: C30.2 IC4.1
NetC31_1: C31.1 IC4.44 | length 2.1
  Top Layer w0.3: C31.1 78.613,49.867 IC4.44
NetC31_2: C31.2 IC4.43 | length 5.4
  Top Layer w0.3: C31.2 75.813,50.286 76.074,50.547 IC4.43
NetC32_2: C32.2 IC3.24 | length 2.8
  Top Layer w0.3: C32.2 77.216,37.823 C32.2@77.701,37.338 ; C32.2@77.701,37.337 IC3.24
NetC37_2: C37.2 IC4.24 | length 2.8
  Top Layer w0.3: C37.2 76.499,62.611 IC4.24
NetD1_1: D1.1 IC1.6 J3.3 R4.1 | length 21.3
  Top Layer w0.3: J3.3 53.674,24.083 59.944,30.353 R4.1 61.326,30.368 D1.1 60.418,33.621 60.071,33.274 IC1.6
NetD1_2: D1.2 IC1.7 J2.1 J3.2 | length 21
  Top Layer w0.2: IC1.7 62.509,34.544 62.626,34.427 D1.2
  Top Layer w0.3: J3.2 61.341,22.225 61.341,26.162 J2.1 61.468,28.067 62.626,29.225 D1.2
NetF7_2: F7.2 P9.1 | length 7.7
  Top Layer w1: F7.2 35.34,95.538 36.424,96.622 P9.1
NetF8_2: F8.2 P9.2 | length 5.7
  Top Layer w1: F8.2 39.304,92.771 41.111,94.578 41.111,96.424 P9.2
NetF9_2: F9.2 P9.3 | length 5.1
  Top Layer w1: F9.2 43.241,93.787 43.651,94.197 43.651,96.424 P9.3
NetF10_2: F10.2 P9.4 | length 5.2
  Top Layer w1: P9.4 46.586,96.424 46.586,94.257 47.139,93.704 F10.2
NetF11_2: F11.2 P9.5 | length 5.8
  Top Layer w1: P9.5 49.126,96.424 49.126,95.4 51.088,93.438 F11.2
NetF12_2: F12.2 P9.6 | length 6.9
  Top Layer w1: P9.6 51.666,96.424 51.666,95.527 54.425,92.768 54.425,91.966 F12.2@54.725,91.666 ; F12.2@54.725,91.666 55.025,91.666 F12.2@54.725,91.666
NetIC2_4: IC2.4 R8.1 | length 2.8
  Top Layer w0.3: IC2.4 41.062,58.252 41.489,57.825 41.489,57.762 41.974,57.277 R8.1
NetIC2_5: IC2.5 R5.1 R7.2 | length 7.9
  Top Layer w0.3: IC2.5 46.79,59.617 46.99,59.417 R5.1 47.117,55.88 R7.2
NetIC3_28: IC3.28 R14.2 | length 4.9
  Top Layer w0.2: R14.2 76.753,32.34 77.526,32.34 78.352,33.166 78.352,34.537 78.612,34.797 IC3.28
NetIC4_28: IC4.28 R17.2 | length 5.3
  Top Layer w0.2: R17.2 75.148,58.173 76.715,58.173 76.962,58.42 76.962,59.563 77.47,60.071 IC4.28
NetJ2_2: J2.2 R4.2 | length 4.1
  Top Layer w0.3: J2.2 64.008,30.22 R4.2
NetLED1_A: LED1.A U1.39 | length 20.4
  Top Layer w0.2: v1(40.767,40.005) 40.767,37.957 40.97,37.754 U1.39
  Top Layer w0.3: v1(53.848,42.291) 53.932,42.291 54.059,42.164 LED1.A
  Bottom Layer w0.2: v1(40.767,40.005) 43.053,42.291 v1(53.848,42.291)
NetLED1_K: LED1.K R3.1 | length 4.1
  Top Layer w0.3: R3.1 55.62,44.831 LED1.K
NetR2_2: R2.2 U1.60 | length 9.2
  Top Layer w0.2: U1.60 37.462,45.464
  Top Layer w0.3: R2.2 35.814,47.752 37.462,46.104 37.462,45.464
NetR7_1: R7.1 VR1.1 VR1.W | length 7.7
  Top Layer w0.3: R7.1 51.689,53.594 52.832,54.737 VR1.1
  Bottom Layer w0.3: VR1.1 VR1.W
NFAULT_DRV1: IC4.26 R15.2 U1.45 | length 65.5
  Top Layer w0.2: U1.45 46.758,40.154 47.498,40.894 v1(48.006,40.894) ; v1(71.247,63.119) R15.2 73.66,62.117 74.436,61.341 IC4.26
  Int2 (Sign) w0.2: v1(48.006,40.894) 49.149,40.894 51.816,43.561 60.325,43.561 67.818,51.054 77.216,51.054 78.613,52.451 78.613,59.944 75.438,63.119 v1(71.247,63.119)
NFAULT_DRV2: IC3.26 R12.2 U1.44 | length 38.2
  Top Layer w0.2: U1.44 70.736,39.754 R12.2 71.755,39.624 75.312,36.067 IC3.26
NHOME_DRV1: IC4.27 R16.2 U1.22 | length 69.6
  Top Layer w0.2: U1.22 37.862,31.239 38.608,30.493 v1(38.608,30.48) ; v1(71.374,57.912) R16.2 ; R16.2@72.898,57.975 73.433,58.511 73.497,58.511 73.996,59.01 75.901,59.01 76.073,59.182 76.073,60.325 76.455,60.707 IC4.27
  Bottom Layer w0.2: v1(38.608,30.48) 38.608,31.403 38.1,31.911 38.1,40.64 44.514,47.053 70.421,47.053 71.374,48.006 v1(71.374,57.912)
NHOME_DRV2: IC3.27 R13.2 U1.23 | length 48.7
  Top Layer w0.2: U1.23 38.262,32.604 v1(38.862,32.004) ; v1(73.406,33.401) 73.406,32.502 73.523,32.385 R13.2 ; R13.2@74.803,32.448 75.882,33.528 77.47,33.528 77.851,33.909 77.851,35.316 77.968,35.433 IC3.27
  Int2 (Sign) w0.2: v1(38.862,32.004) 47.464,32.004 49.75,29.718 68.58,29.718 72.263,33.401 v1(73.406,33.401)
OSC_IN: R10.2 U1.5 | length 23.4
  Top Layer w0.2: R10.2 25.527,53.721 26.162,53.086 26.162,40.894 27.302,39.754 U1.5
OSC_OUT: R11.1 U1.6 | length 16
  Top Layer w0.2: R11.1 24.257,41.656 26.559,39.354 U1.6
RESET: C22.2 D3.2 J1.3 R9.1 SW1.1 U1.7 | length 135.8
  Top Layer w0.2: U1.7 36.033,38.954 v1(36.703,39.624)
  Top Layer w0.3: v1(35.56,28.829) 35.56,25.576 35.736,25.4 R9.1 37.211,23.368 C22.2 ; SW1.1 38.517,16.473 38.989,16.945 38.989,19.431 37.338,21.082 C22.2 ; D3.2 39.8,23.114 39.673,23.241 C22.2
  Int2 (Sign) w0.2: v1(36.703,39.624) 37.084,39.243 37.084,35.56 36.703,35.179 31.877,35.179 29.718,37.338 29.718,78.359 43.053,91.694 56.007,91.694 63.119,98.806 68.834,98.806 69.596,98.044 J1.3
  Bottom Layer w0.2: v1(35.56,28.829) 37.211,30.48 37.211,39.116 v1(36.703,39.624)
SPI2_MISO: IC3.36 IC4.36 U1.38 | length 83.6
  Top Layer w0.2: U1.38 62.087,37.354 65.786,33.655 65.786,28.321 69.215,24.892 v1(69.723,24.892) ; v1(69.596,27.686) 70.358,27.686 71.374,28.702 71.755,28.702 72.77,29.717 IC3.36 ; v1(72.898,55.245) 76.962,55.245 77.216,54.991 IC4.36
  Bottom Layer w0.2: v1(69.723,24.892) 69.659,24.956 69.659,27.622 v1(69.596,27.686) 69.596,31.056 72.17,33.631 72.182,33.642 72.182,54.474 72.898,55.19 v1(72.898,55.245)
SPI2_MOSI: IC3.37 IC4.37 U1.41 | length 80
  Top Layer w0.2: U1.41 61.903,38.554 66.167,34.29 66.167,33.84 66.186,33.821 66.186,28.556 68.677,26.065 68.961,25.781 v1(71.374,25.781) ; v1(71.501,27.559) 72.517,27.559 74.041,29.083 IC3.37 ; v1(74.168,54.356) IC4.37
  Bottom Layer w0.2: v1(71.374,25.781) 71.438,25.845 71.438,27.495 72.644,28.702 72.644,52.832 v1(74.168,54.356)
SPI2_NSS_DRV1: IC4.34 U1.58 | length 53
  Top Layer w0.2: U1.58 38.262,48.93 43.942,54.61 47.498,54.61 51.435,50.673 62.738,50.673 68.257,56.192 78.588,56.192 IC4.34
SPI2_NSS_DRV2: IC3.34 U1.57 | length 80.5
  Top Layer w0.2: U1.57 38.662,46.663 v1(39.37,47.371) ; v1(77.089,30.353) 77.787,30.353 78.421,30.987 IC3.34
  Int2 (Sign) w0.2: v1(39.37,47.371) 37.719,45.72 37.719,29.972 50.8,16.891 70.485,16.891 77.089,23.495 v1(77.089,30.353)
SPI2_SCK: IC3.38 IC4.38 U1.42 | length 76.2
  Top Layer w0.2: U1.42 62.138,38.954 66.567,34.525 66.567,34.005 66.586,33.986 66.586,28.791 68.707,26.67 75.946,26.67 77.724,28.448 IC3.38 IC3.38 ; v1(75.565,53.467) 75.676,53.467 75.93,53.721 IC4.38
  Bottom Layer w0.2: v1(74.803,26.67) 74.803,27.178 75.184,27.559 75.184,53.086 v1(75.565,53.467)
TIM2_CH1_STEP: IC4.39 U1.50 | length 43.8
  Top Layer w0.2: v1(40.64,44.45) 41.462,43.628 U1.50 ; v1(70.358,52.451) 76.327,52.451 76.963,53.087 IC4.39
  Int2 (Sign) w0.2: v1(40.64,44.45) 59.817,44.45 67.31,51.943 69.85,51.943 v1(70.358,52.451)
TIM5_CH1_STEP: IC3.39 U1.56 | length 56.6
  Top Layer w0.2: v1(39.062,39.824) U1.56 ; v1(73.152,23.876) 73.914,23.876 77.851,27.813 IC3.39
  Bottom Layer w0.2: v1(39.062,39.824) 40.278,38.608 51.816,38.608 54.513,35.911 54.513,27.529 58.166,23.876 v1(73.152,23.876)
Vref_DRV1: IC4.33 VR3.W | length 13.2
  Top Layer w0.3: VR3.W 66.066,56.007 66.701,56.642 76.708,56.642 76.963,56.897 IC4.33
Vref_DRV2: IC3.33 VR2.W | length 12
  Top Layer w0.3: VR2.W 72.136,32.385 73.406,31.115 77.597,31.115 78.105,31.623 IC3.33
pads on no net: IC3.29 IC3.30 IC3.31 IC3.32 IC3.35 IC4.29 IC4.30 IC4.31 IC4.32 IC4.35 P3.0 P3.2 P3.5 P5.0 P5.2 P5.5 SW1.0 U1.1 U1.2 U1.3 U1.4 U1.8 U1.9 U1.10 U1.11 U1.16 U1.17 U1.20 U1.21 U1.24 U1.25 U1.26 U1.27 U1.28 U1.29 U1.35 U1.40 U1.43 U1.51 U1.52 U1.53 U1.54 U1.59

## Polygon pours and split planes (outlines as drawn)
GND on Top Layer "GND_L01_P015" (solid, pour order 15): 29.464,57.531 29.845,57.15 29.845,52.578 29.972,52.451 36.576,52.451 36.703,52.578 36.703,54.229 37.846,55.372 37.846,57.531 38.608,58.293 38.608,59.563 38.1,60.071 16.002,60.071 15.367,59.436 15.367,54.707 15.415,54.659 15.415,42.799 17.526,40.688 17.526,28.829 15.415,26.67 15.415,24.082 17.526,21.971 35.814,21.971 35.814,24.13 34.798,25.146 34.798,31.877 33.782,32.893 32.893,32.893 32.893,34.798 32.766,34.925 27.051,34.925 26.543,35.179 21.463,40.64 21.463,41.021 17.399,45.085 17.399,54.61 20.32,57.531
+3V3 on Top Layer "+3V3_L01_P017" (solid, pour order 17): 69.088,77.851 69.469,77.47 69.469,75.057 69.215,74.803 55.88,74.803 54.991,73.914 54.991,73.787 51.308,73.787 50.927,74.168 50.927,77.597 51.181,77.851
+48V on Top Layer "+48V_L01_P014" (solid, pour order 14): 57.785,89.535 58.166,89.154 58.166,88.265 57.15,87.249 34.417,87.249 22.288,75.12 22.288,68.644 22.352,68.58 22.352,65.659 24.765,62.611 41.91,62.611 41.91,60.452 41.783,60.325 40.132,60.325 39.624,60.833 38.354,60.833 38.227,60.706 17.907,60.706 17.907,73.787 33.655,89.535
NetC30_1 on Top Layer "NETC30_1_L01_P001" (solid, pour order 1): 90.545,56.025 90.553,56.017 90.551,56.016 90.551,50.8 88.011,50.8 87.958,50.763 85.491,50.763 85.475,50.748 85.471,50.33 85.473,50.329 87.981,50.329 88.011,50.299 88.011,50.292 90.551,50.292 90.551,49.403 90.805,49.149 90.932,49.276 96.52,49.276 96.647,49.403 96.647,61.341 96.139,61.849 92.964,61.849 92.964,63.119 92.837,63.246 90.551,63.246 90.17,62.865 90.163,62.865 90.132,62.826 85.474,62.826 85.471,62.83 85.471,62.395 85.473,62.396 87.828,62.396 87.829,62.396 89.249,62.396 89.249,62.389 89.298,62.341 89.776,61.849 90.551,61.849 90.551,57.15 88.027,57.15 87.989,57.112 87.979,57.112 86.315,57.113 85.465,57.113 85.465,56.692 85.465,56.042 85.482,56.025
NetC11_2 on Top Layer "NETC11_2_L01_P016" (solid, pour order 16): 35.941,83.058 36.195,83.312 41.021,83.312 46.482,77.851 47.371,77.851 47.625,77.597 47.625,73.533 46.482,72.39 46.482,65.024 47.498,64.008 47.498,62.992 47.371,62.865 45.72,62.865 45.593,62.992 45.593,64.688 44.407,65.874 44.45,65.917 44.45,68.199 35.941,76.708
AOUT1_DRV1 on Top Layer "AOUT1_DRV1_L01_P012" (solid, pour order 12): 85.471,53.304 88.936,53.304 89.408,52.832 89.408,51.816 89.19,51.598 85.471,51.598
AOUT2_DRV1 on Top Layer "AOUT2_DRV1_L01_P011" (solid, pour order 11): 89.154,55.245 89.407,54.992 89.408,54.939 89.408,53.848 89.064,53.504 85.475,53.508 85.471,53.505 85.471,55.21 87.404,55.21 87.439,55.245
BOUT1_DRV1 on Top Layer "BOUT1_DRV1_L01_P010" (solid, pour order 10): 85.485,59.658 88.956,59.658 89.041,59.574 89.397,59.219 89.415,59.219 89.415,58.447 88.913,57.946 85.45,57.946 85.45,59.622
BOUT2_DRV1 on Top Layer "BOUT2_DRV1_L01_P009" (solid, pour order 9): 88.813,61.547 89.273,61.087 89.281,61.087 89.281,60.198 88.927,59.844 85.471,59.844 85.471,61.595 86.914,61.57 88.344,61.547
AOUT1_DRV2 on Top Layer "AOUT1_DRV2_L01_P007" (solid, pour order 7): 86.581,26.324 88.865,26.324 88.9,26.289 88.9,26.288 88.923,26.266 89.893,26.266 90.424,26.797 90.424,27.686 90.075,28.035 86.581,28.035
AOUT2_DRV2 on Top Layer "AOUT2_DRV2_L01_P006" (solid, pour order 6): 89.82,28.225 90.297,28.702 90.297,29.474 90.16,29.612 90,29.93 86.56,29.93 86.578,28.231 87.387,28.223 87.389,28.225
BOUT1_DRV2 on Top Layer "BOUT1_DRV2_L01_P005" (solid, pour order 5): 88.541,34.371 88.708,34.203 90.181,34.203 90.318,34.116 90.318,33.244 90.32,33.242 89.929,32.85 89.308,32.85 89.101,32.643 86.612,32.643 86.58,32.676 86.58,34.371
BOUT2_DRV2 on Top Layer "BOUT2_DRV2_L01_P003" (solid, pour order 3): 88.489,34.58 88.591,34.682 90.052,34.68 90.479,35.107 90.479,36.14 90.297,36.322 89.027,36.322 88.646,36.322 88.646,36.32 88.61,36.285 86.575,36.285 86.576,36.283 86.573,36.279 86.576,36.276 86.576,34.583 88.267,34.583 88.27,34.58
NetC25_1 on Top Layer "NETC25_1_L01_P000" (solid, remove dead copper, pour order 0): 86.569,25.479 86.579,25.489 86.599,25.489 88.269,25.489 88.27,25.488 88.395,25.488 88.433,25.527 91.059,25.527 91.059,30.836 89.326,30.797 87.953,30.766 86.585,30.763 86.585,31.84 89.752,31.84 90.678,32.766 90.678,37.115 86.583,37.115 86.566,37.132 86.566,37.538 86.619,37.592 88.272,37.593 89.916,37.592 89.916,38.178 89.96,38.222 89.962,38.22 93.091,38.22 93.091,30.883 95.609,30.883 95.758,30.734 95.758,24.384 95.631,24.257 89.535,24.257 89.404,24.388 89.404,25.019 88.474,25.019 88.438,25.055 86.571,25.055 86.57,25.054 86.569,25.056
GND on Int1 (GND) (split plane): 110.973,99.374 111,99.35 111.011,99.343 111.021,99.334 111.054,99.317 111.086,99.298 111.098,99.293 111.11,99.287 111.145,99.277 111.18,99.264 111.193,99.262 111.205,99.258 111.242,99.255 111.279,99.249 111.292,99.25 111.305,99.248 114.852,99.248 114.937,99.231 115.018,99.198 115.09,99.15 115.152,99.088 115.2,99.016 115.233,98.935 115.25,98.85 115.25,98.806 115.25,18.288 115.25,13.462 115.25,13.368 115.214,13.185 115.142,13.012 115.038,12.856 114.906,12.724 114.75,12.62 114.577,12.548 114.394,12.512 1.875,12.512 1.691,12.548 1.518,12.62 1.363,12.724 1.23,12.856 1.126,13.012 1.055,13.185 1.018,13.368 1.018,13.462 1.018,16.002 1.018,98.425 1.018,98.519 1.055,98.702 1.126,98.875 1.23,99.031 1.363,99.163 1.518,99.267 1.691,99.339 1.875,99.375 110.971,99.375
GND on Int4 (GND) (split plane): 110.973,99.374 111,99.35 111.011,99.343 111.021,99.334 111.054,99.317 111.086,99.298 111.098,99.293 111.11,99.287 111.145,99.277 111.18,99.264 111.193,99.262 111.205,99.258 111.242,99.255 111.279,99.249 111.292,99.25 111.305,99.248 114.852,99.248 114.937,99.231 115.018,99.198 115.09,99.15 115.152,99.088 115.2,99.016 115.233,98.935 115.25,98.85 115.25,98.806 115.25,18.288 115.25,13.462 115.25,13.368 115.214,13.185 115.142,13.012 115.038,12.856 114.906,12.724 114.75,12.62 114.577,12.548 114.394,12.512 1.875,12.512 1.691,12.548 1.518,12.62 1.363,12.724 1.23,12.856 1.126,13.012 1.055,13.185 1.018,13.368 1.018,13.462 1.018,16.002 1.018,98.425 1.018,98.519 1.055,98.702 1.126,98.875 1.23,99.031 1.363,99.163 1.518,99.267 1.691,99.339 1.875,99.375 110.971,99.375

## Silkscreen, mask and mechanical layers (free items; w line width, h text height)
Mechanical 1:
  lines w0.381: 110.871,99.568 114.808,99.568 cw(c114.808,98.806) 115.57,98.806 115.57,18.288 115.57,13.462 cw(c114.3,13.462) 114.3,12.192 1.968,12.192 cw(c1.968,13.462) 0.698,13.462 0.698,16.002 0.699,98.425 cw(c1.968,98.425) 1.968,99.695 111.125,99.695

## Text inside footprints (layer, text, board x,y; h text height)
J1: Top Overlay "6" at 65.532,94.488 h1.27 r180; Top Overlay "5" at 65.532,97.028 h1.27 r180; Top Overlay "2" at 74.676,94.488 h1.27 r180; Top Overlay "1" at 74.168,97.028 h1.27 r180